# Allegro board JY02_V10_220108.brd
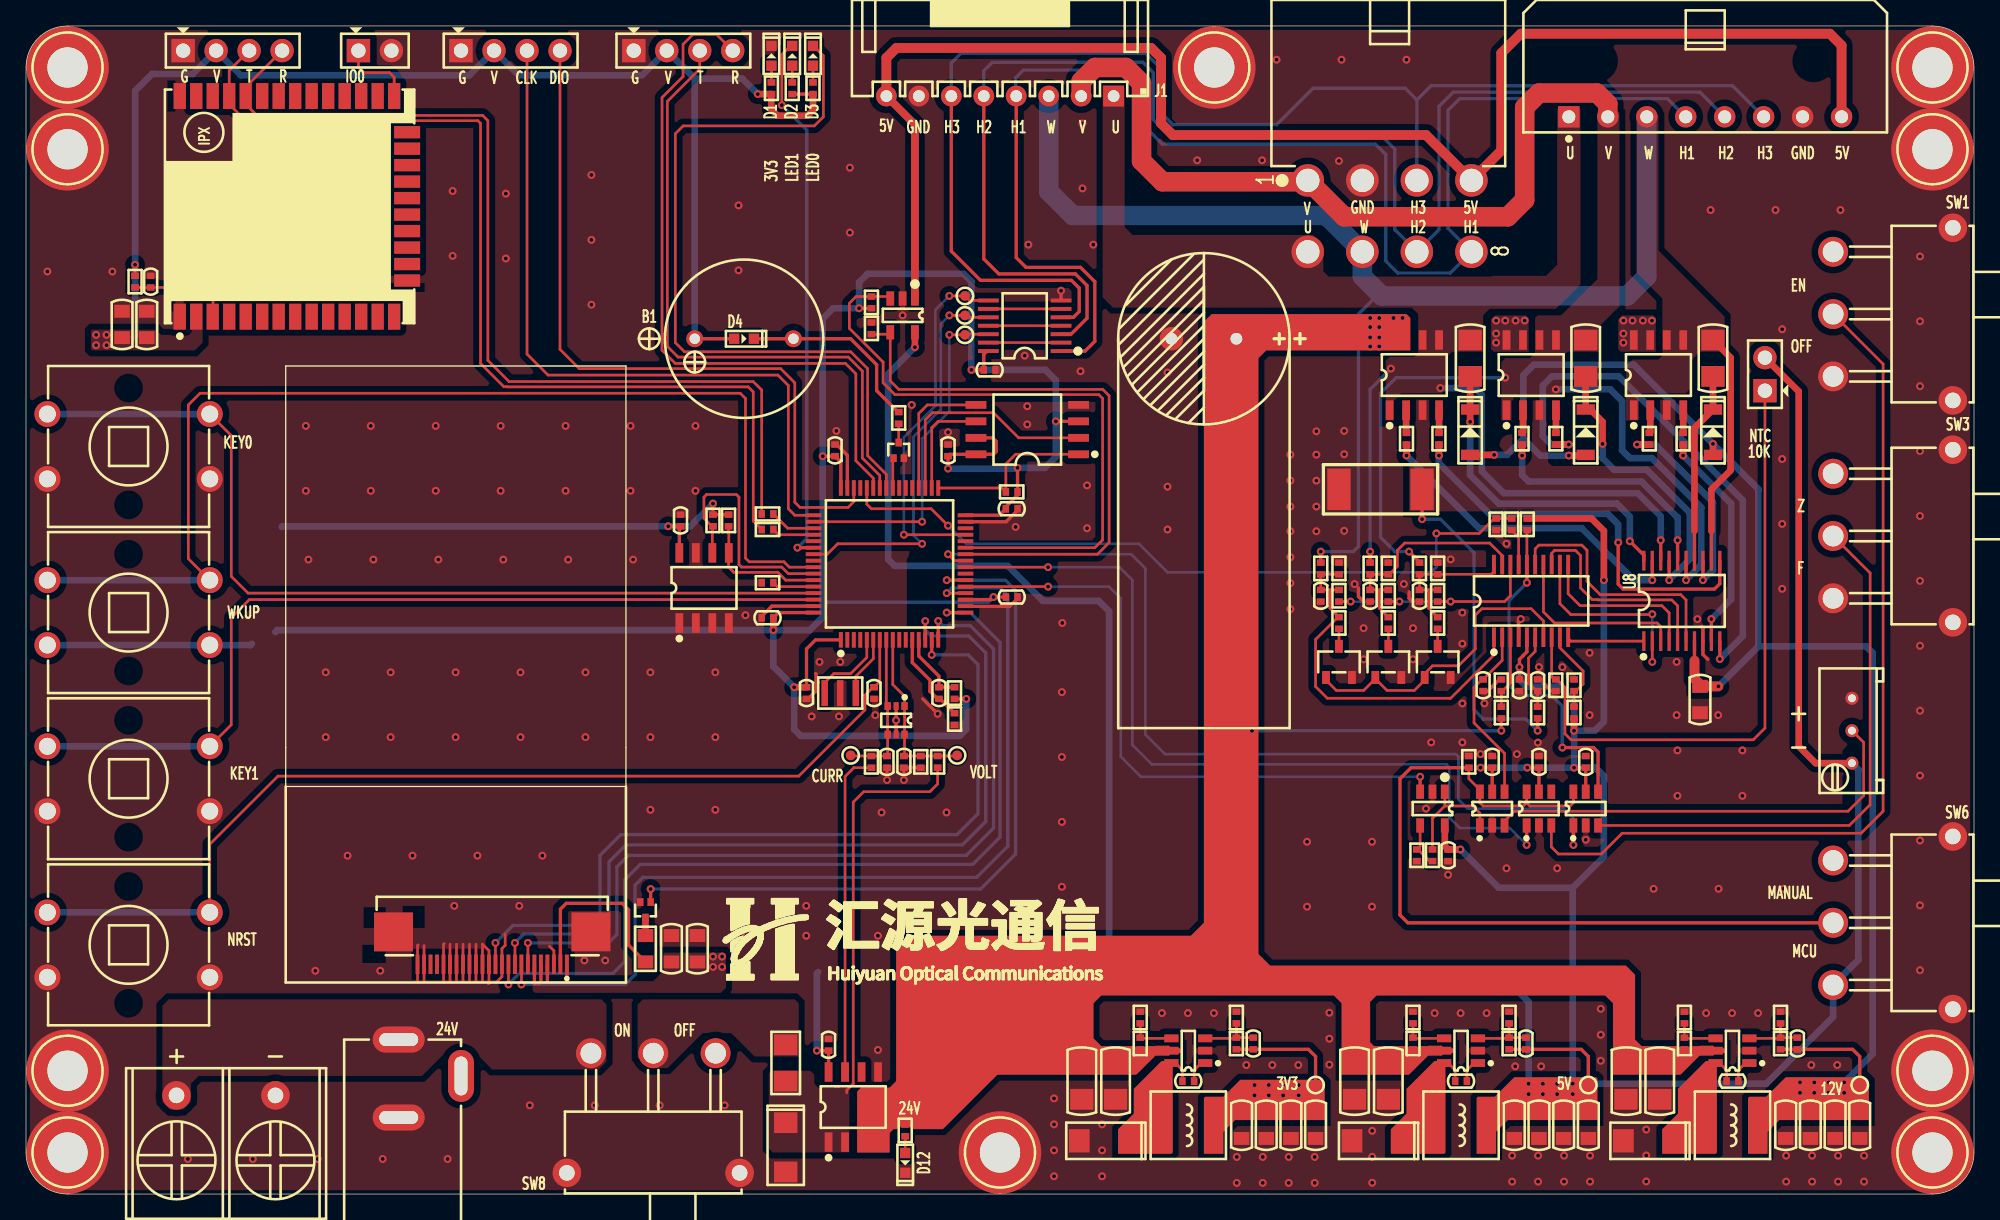
[diagram p0: board, top side]
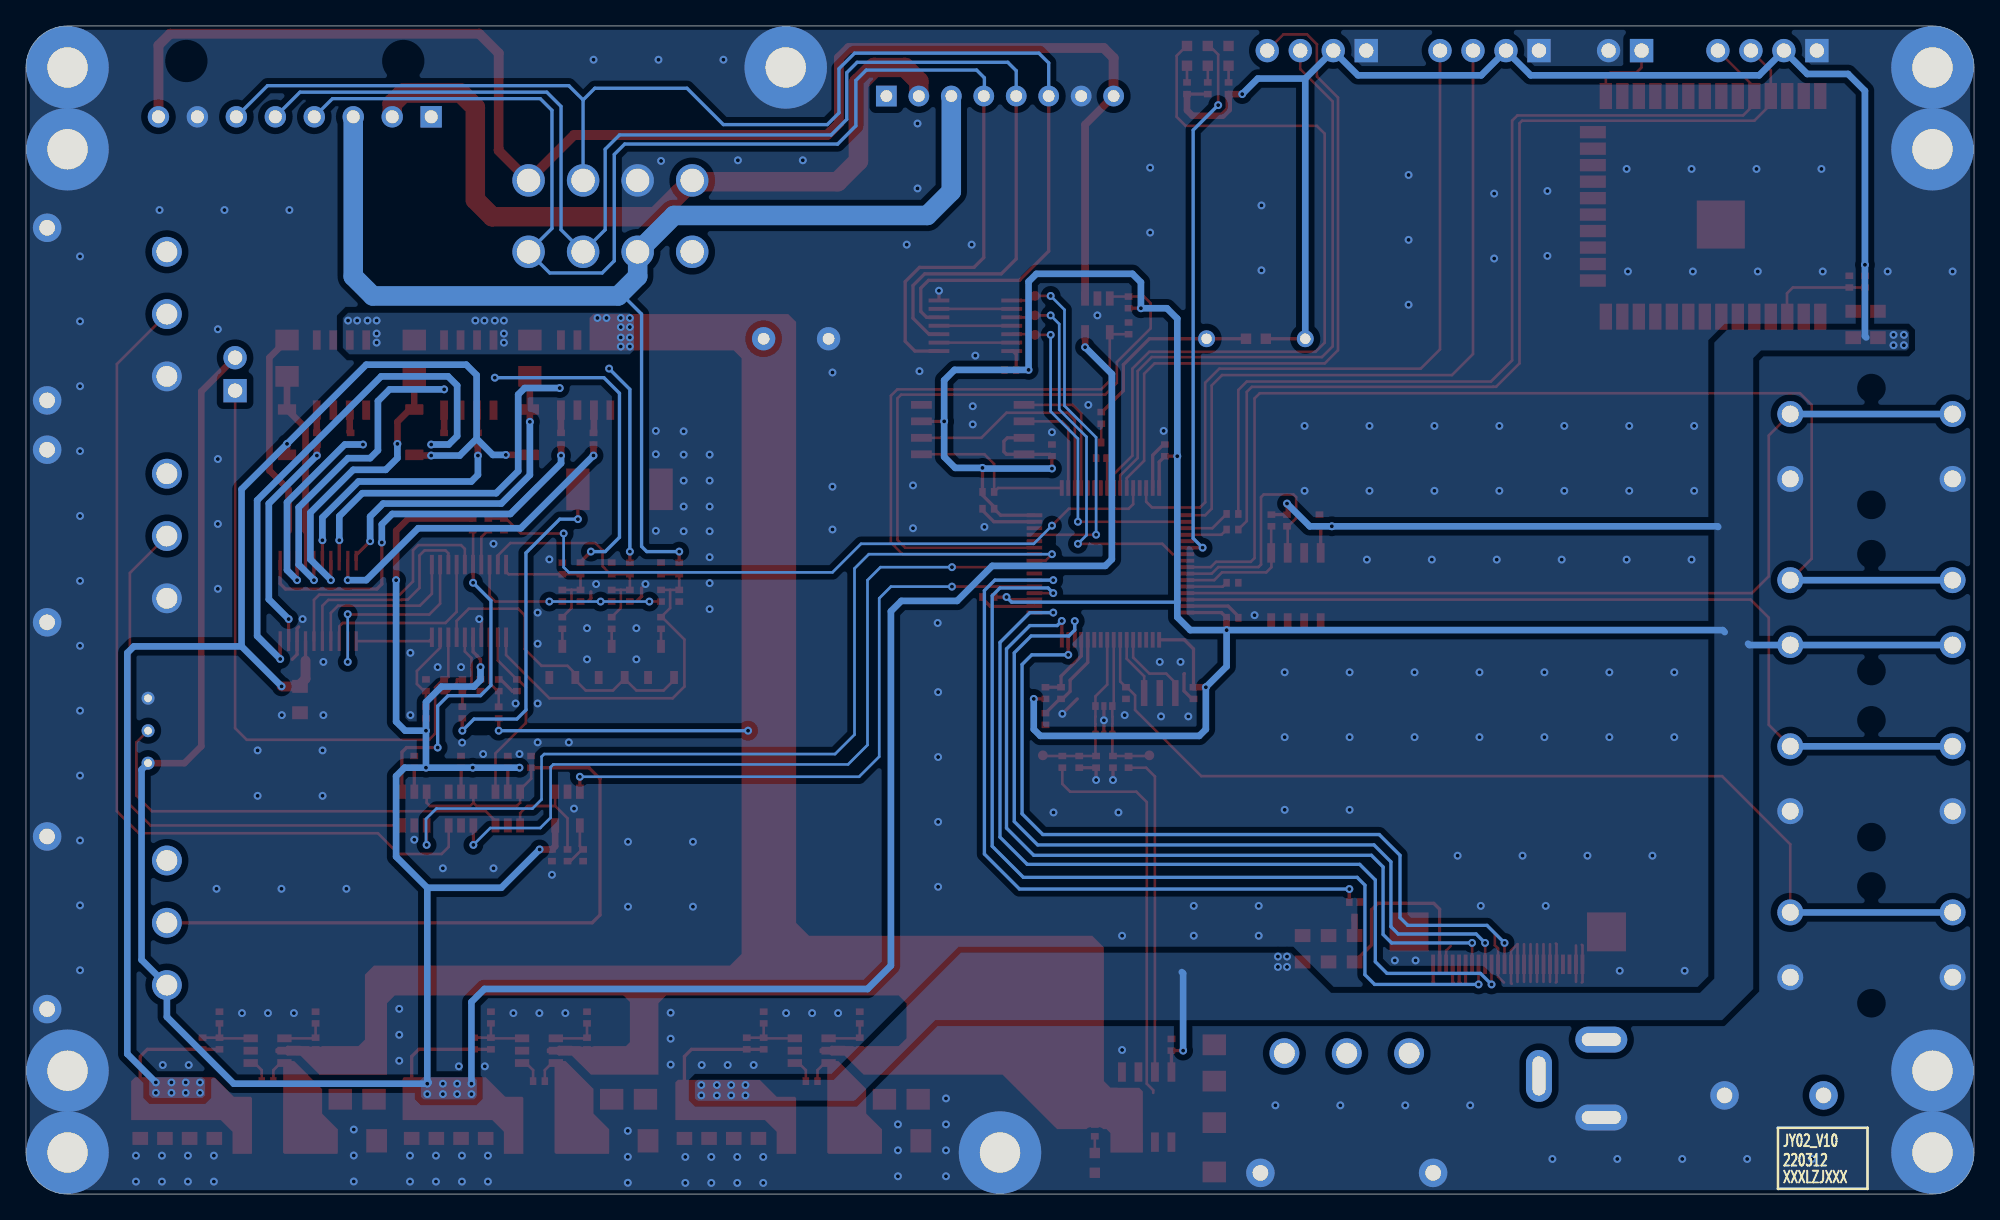
[diagram p1: board, bottom side, seen from below]

Outline 150 x 90 mm; copper layers: TOP, BOTTOM. Coordinates in mm from the lower left corner of the outline.
Outline path: 0,86.8 arc(0.94,89.06) 3.2,90 146.8,90 arc(149.06,89.06) 150,86.8 150,3.2 arc(149.06,0.94) 146.8,0 3.2,0 arc(0.94,0.94) 0,3.2 0,86.8

## Design rules (mm)
constraint set DEFAULT: min track width 0.203, pair gap 0.203

## Placement (name value [footprint] x y rotation side)
B1  -  [TMB12A03]  55.29 65.9 0 top
C1  100nF_50V  [C0402]  9.6 70.3 270 top
C2  10uF_25V  [C0805]  7.4 67 270 top
C3  10uF_25V  [C0805]  9.3 67 270 top
C4  1000uF_50V  [CAP-5R0-13X27]  90.7 65.9 180 top
C5  10uF_50V  [C1206]  111.2 64.4 90 top
C6  10uF_50V  [C1206]  120.1 64.4 90 top
C7  10uF_50V  [C1206]  129.9 64.4 90 top
C8  100nF_50V  [C0402]  74.2 63.5 180 top
C9  100nF_50V  [C0402]  62.3 57.3 270 top
C10  100nF_50V  [C0402]  71 57.3 90 top
C11  100nF_50V  [C0402]  75.9 52.8 180 top
C12  100nF_50V  [C0402]  50.4 51.9 270 top
C13  1uF_50V  [C0402]  99.7 46.1 270 top
C14  1uF_50V  [C0402]  103.5 46.1 270 top
C15  1uF_50V  [C0402]  107.3 46.1 270 top
C16  100nF_50V  [C0402]  75.9 46 180 top
C17  100nF_50V  [C0402]  57.1 44.4 0 top
C18  100nF_50V  [C0402]  112.2 39.2 270 top
C19  100nF_50V  [C0402]  115 39.2 90 top
C20  100nF_50V  [C0402]  116.4 39.2 90 top
C21  100nF_50V  [C0402]  60.1 38.6 90 top
C22  100nF_50V  [C0402]  65.3 38.6 270 top
C24  100nF_50V  [C0402]  70.3 38.6 90 top
C25  10uF_25V  [C0805]  128.9 38.1 270 top
C26  100nF_50V  [C0402]  66.3 33.3 90 top
C27  100nF_50V  [C0402]  67.6 33.3 270 top
C28  100nF_50V  [C0402]  112.9 33.3 90 top
C29  100nF_50V  [C0402]  116.5 33.3 90 top
C30  100nF_50V  [C0402]  120.1 33.3 90 top
C31  100nF_50V  [C0402]  109.5 26.1 90 top
C32  10uF_25V  [C0805]  49.7 18.9 270 top
C33  10uF_25V  [C0805]  51.7 18.9 270 top
C34  33pF_50V  [C0402]  94.5 11.6 270 top
C35  33pF_50V  [C0402]  115.5 11.6 270 top
C36  33pF_50V  [C0402]  136.4 11.6 270 top
C37  100nF_50V  [C0402]  61.8 11.5 90 top
C38  10uF_50V  [C1206]  81.3 8.7 270 top
C39  10uF_50V  [C1206]  83.9 8.7 270 top
C40  100nF_50V  [C0402]  89.5 8.7 0 top
C41  10uF_50V  [C1206]  102.3 8.7 270 top
C42  10uF_50V  [C1206]  104.9 8.7 270 top
C43  100nF_50V  [C0402]  110.5 8.7 0 top
C44  10uF_50V  [C1206]  123.2 8.7 270 top
C45  10uF_50V  [C1206]  125.8 8.7 270 top
C46  100nF_50V  [C0402]  131.4 8.7 0 top
C47  10uF_25V  [C0805]  93.6 5.3 270 top
C48  10uF_25V  [C0805]  95.5 5.3 270 top
C49  10uF_25V  [C0805]  97.4 5.3 270 top
C50  10uF_25V  [C0805]  99.3 5.3 270 top
C51  10uF_25V  [C0805]  114.6 5.3 270 top
C52  10uF_25V  [C0805]  116.5 5.3 270 top
C53  10uF_25V  [C0805]  118.4 5.3 270 top
C54  10uF_25V  [C0805]  120.3 5.3 270 top
C55  10uF_25V  [C0805]  135.5 5.3 270 top
C56  10uF_25V  [C0805]  137.4 5.3 270 top
C57  10uF_25V  [C0805]  139.3 5.3 270 top
C58  10uF_25V  [C0805]  141.2 5.3 270 top
D1  GREEN_0603  [LED0603]  57.4 87.7 90 top
D2  GREEN_0603  [LED0603]  59 87.7 90 top
D3  GREEN_0603  [LED0603]  60.6 87.7 90 top
D4  GREEN-0603/NI  [LED0603]  55.29 65.9 0 top
D5  1N4148  [SOD123]  111.2 58.7 270 top
D6  1N4148  [SOD123]  120.1 58.7 270 top
D7  1N4148  [SOD123]  129.9 58.7 270 top
D8  SS56F  [SMAF]  83 4.1 0 top
D9  SS56F  [SMAF]  104 4.1 0 top
D10  SS56F  [SMAF]  124.9 4.1 0 top
D11  SS56F  [SMAF]  58.5 3.6 90 top
D12  GREEN_0603  [LED0603]  67.7 2.4 270 top
DC1  -  [DC005]  28.7 5.9 90 top
F1  0469005.WR  [FUSE1206]  58.5 10.1 270 top
J1  -  [HX25035-8WA]  75 84.6 180 top
J2  -  [CN1X4-2P54-Z]  12.1 88.1 0 top
J3  -  [CN1X2-2P54-Z]  25.6 88.1 0 top
J4  -  [CN1X4-2P54-Z]  33.5 88.1 0 top
J5  -  [CN1X4-2P54-Z]  46.8 88.1 0 top
J6  -  [43650-0800]  129.3 83 180 top
J7  -  [HX42003-8WAF]  105 78.1 90 top
J8  3296W-50K  [3296W]  140.6 35.7 270 top
J9  0.5K-AS-24PWBG  [0R5K-AS-24PWBG]  35.9 17.7 180 top
J10  KF7.62-2P  [KF7R62-2P]  15.4 7.6 180 top
L1  SWPA5020S4R7  [L5020]  89.5 5.3 0 top
L2  SWPA5020S4R7  [L5020]  110.5 5.3 0 top
L3  SWPA5020S4R7  [L5020]  131.4 5.3 0 top
MH1  Hold-M3/NI  [HOLD6R35X3R10]  3.2 86.8 0 top
MH2  Hold-M3/NI  [HOLD6R35X3R10]  91.5 86.8 0 top
MH3  Hold-M3/NI  [HOLD6R35X3R10]  146.8 86.8 0 top
MH4  Hold-M3/NI  [HOLD6R35X3R10]  3.2 80.5 0 top
MH5  Hold-M3/NI  [HOLD6R35X3R10]  146.8 80.5 0 top
MH6  Hold-M3/NI  [HOLD6R35X3R10]  3.2 9.5 0 top
MH7  Hold-M3/NI  [HOLD6R35X3R10]  146.8 9.5 0 top
MH8  Hold-M3/NI  [HOLD6R35X3R10]  3.2 3.2 0 top
MH9  Hold-M3/NI  [HOLD6R35X3R10]  75 3.2 0 top
MH10  Hold-M3/NI  [HOLD6R35X3R10]  146.8 3.2 0 top
NOREF  -  []  0 0 90 top
NOREF#2  -  []  0 0 90 top
NOREF#3  -  []  0 0 0 top
NOREF#4  -  []  0 0 90 top
NOREF#5  -  []  0 0 0 top
NOREF#6  -  []  0 0 90 top
NOREF#7  -  []  0 0 0 top
NOREF#8  -  []  0 0 90 top
NOREF#9  -  []  -0.21 0 0 top
NOREF#10  -  []  0 0 0 top
NOREF#11  -  []  0 0 0 top
Q1  NCE6005AS  [SOIC8]  106.9 63.1 0 top
Q2  NCE6005AS  [SOIC8]  115.9 63.1 0 top
Q3  NCE6005AS  [SOIC8]  125.7 63.1 0 top
Q4  DTC043ZMT2L  [SOT723]  67.2 57.3 0 top
Q5  DTC043ZMT2L  [SOT723]  47.7 21.9 180 top
Q6  AO3400  [SOT23-3]  104.9 41 270 top
Q7  AO3400  [SOT23-3]  108.7 41 270 top
Q8  AO3400  [SOT23-3]  101.1 41 270 top
R1  10K  [R0402]  57.4 85.2 90 top
R2  10K  [R0402]  59 85.2 90 top
R3  10K  [R0402]  60.6 85.2 90 top
R4  10K  [R0402]  8.4 70.3 270 top
R5  100K  [R0402]  65.1 68.7 270 top
R6  100K  [R0402]  65.1 66.7 90 top
R8  1K  [R0402]  67.2 59.8 270 top
R9  51R  [R0402]  106.3 58.2 90 top
R10  51R  [R0402]  108.8 58.2 90 top
R11  51R  [R0402]  115.2 58.2 90 top
R12  51R  [R0402]  117.8 58.2 90 top
R13  51R  [R0402]  125 58.2 90 top
R14  51R  [R0402]  127.6 58.2 90 top
R15  0R02  [R2512]  104.3 54.3 0 top
R16  10K  [R0402]  75.9 54.1 180 top
R17  1K  [R0402]  57.1 52.4 0 top
R18  4.7K  [R0402]  52.9 51.9 90 top
R19  4.7K  [R0402]  54.1 51.9 90 top
R21  10K  [R0402]  115.6 51.6 90 top
R22  1K  [R0402]  57.1 51.2 0 top
R23  10K  [R0402]  99.7 48.2 270 top
R25  10K  [R0402]  103.5 48.2 270 top
R27  10K  [R0402]  107.3 48.2 270 top
R29  10K  [R0402]  57.1 47.1 180 top
R30  10K  [R0402]  101.1 48.2 270 top
R31  10K  [R0402]  101.1 46.1 270 top
R32  10K  [R0402]  104.9 48.2 270 top
R33  10K  [R0402]  104.9 46.1 270 top
R34  10K  [R0402]  108.7 48.2 270 top
R35  10K  [R0402]  108.7 46.1 270 top
R36  10K  [R0402]  113.6 39.2 270 top
R37  10K  [R0402]  114.4 51.6 270 top
R38  1K  [R0402]  117.8 39.2 90 top
R39  470R  [R0402]  119.2 39.2 270 top
R40  0R  [R0402]  71.5 38.6 270 top
R41  100K  [R0402]  113.6 37.1 270 top
R42  10K  [R0402]  116.4 37.1 270 top
R43  10K  [R0402]  113.2 51.6 90 top
R45  10K  [R0402]  119.2 37.1 270 top
R46  0R  [R0402]  71.5 36.6 270 top
R48  10K  [R0402]  65.1 33.3 90 top
R49  10K  [R0402]  68.9 33.3 90 top
R50  100K  [R0402]  70.2 33.3 270 top
R51  10K  [R0402]  111.1 33.3 270 top
R52  10K  [R0402]  107.1 26.1 270 top
R53  4.99K  [R0402]  108.3 26.1 270 top
R54  10R  [R0805]  47.7 18.9 90 top
R55  20K  [R0402]  85.8 13.6 270 top
R56  32.4K  [R0402]  93.2 13.6 270 top
R57  20K  [R0402]  106.8 13.6 270 top
R58  19.1K  [R0402]  114.2 13.6 270 top
R59  20K  [R0402]  127.7 13.6 270 top
R60  7.15K  [R0402]  135.1 13.6 270 top
R61  100K  [R0402]  85.8 11.6 90 top
R62  100K  [R0402]  93.2 11.6 270 top
R63  100K  [R0402]  106.8 11.6 90 top
R64  100K  [R0402]  114.2 11.6 270 top
R65  100K  [R0402]  127.7 11.6 90 top
R66  100K  [R0402]  135.1 11.6 270 top
R67  10K  [R0402]  67.7 4.9 270 top
R68  MF52A103F3950(A1)  [CN1X2-2P54-Z]  133.9 61.9 90 top
R69  330R  [R0402]  104.9 44 90 top
R70  330R  [R0402]  108.7 44 90 top
R71  330R  [R0402]  101.1 44 90 top
SW1  -  [SS-12D11G3R]  146.8 67.8 270 top
SW2  -  [B3F-4055]  7.9 57.6 180 top
SW3  -  [SS-12D11G3R]  146.8 50.7 270 top
SW4  -  [B3F-4055]  7.9 44.8 180 top
SW5  -  [B3F-4055]  7.9 32 180 top
SW6  -  [SS-12D11G3R]  146.8 20.9 270 top
SW7  -  [B3F-4055]  7.9 19.2 180 top
SW8  -  [SS-12D11G3R]  48.3 3.2 180 top
TP1  TP/NI  [TP-0R75]  72.3 69.2 270 top
TP2  TP/NI  [TP-0R75]  72.3 67.7 270 top
TP3  TP/NI  [TP-0R75]  72.3 66.2 270 top
TP4  TP/NI  [TP-0R75]  63.5 33.8 0 top
TP5  TP/NI  [TP-0R75]  71.7 33.8 0 top
TP6  TP/NI  [TP-0R75]  99.3 8.4 0 top
TP7  TP/NI  [TP-0R75]  120.3 8.4 0 top
TP8  TP/NI  [TP-0R75]  141.2 8.4 0 top
U1  -  [ESP32-WROOM-32U]  17.1 76.1 90 top
U2  AP2171WG-7  [SOT23-5]  67.5 67.7 180 top
U3  SN74LVC14APW  [TSSOP14]  76.9 66.9 90 top
U4  W25Q64JVSSIQ  [SOIC8_208]  77.1 58.9 90 top
U5  STM32F103RCT6  [LQFP64-10X10X0R5]  66.49 48.55 0 top
U6  AT24C512C-SSHM-T  [SOIC8]  52.21 46.7 0 top
U7  JY02A  [SSOP20-8R66X3R90X0R635]  115.9 45.7 0 top
U8  EG2124A  [TSSOP20]  127.5 45.7 0 top
U9  TPD4E1U06DCKR  [SOT363]  67 36.5 180 top
U10  TLV333IDBV  [SOT23-5]  108.3 29.7 180 top
U11  TS5A3159DBVR  [SOT23-6]  112.9 29.7 0 top
U12  TS5A3159DBVR  [SOT23-6]  116.5 29.7 0 top
U13  TS5A3159DBVR  [SOT23-6]  120.1 29.7 0 top
U14  BL9342  [SOT23-6]  89.5 11.05 90 top
U15  BL9342  [SOT23-6]  110.5 11.05 90 top
U16  BL9342  [SOT23-6]  131.4 11.05 90 top
U17  CC6920BSO-10A  [SOIC8]  63.7 6.7 0 top
X1  CSTCE8M00G15C99-R0  [X-3P-3R2X1R3-SMD]  62.7 38.6 0 top

## Library data of the parts
B1 = BEEP_HC12085P
C1 C8-C11 C16 C17 C21 C24 C26 C31 C37 = CAP NP_2
C2 C3 C5-C7 C13-C15 C18-C20 C22 C25 C28-C30 C32-C36 C38-C58 = CAP NP
C4 = CAPT_100UF_3528_6r3V_10%_LXXXX
C12 C27 = CAP NP_3
D1-D4 D12 = LED_4
D5-D11 = DIODE13_9
DC1 = DC005
F1 = FUSE
J1 = CONN RCPT 8
J2 J4 J5 = CONN RCPT 4
J3 J10 R68 = CONN RCPT 2
J6 = 43650-0801
J7 = HX30002-10A_2
J8 = CONN RCPT 3
J9 = 0.5K-AS-24PWBG
L1-L3 = INDUCTOR_0
MH1-MH10 = Hold_1
Q1-Q3 = IRF7351TRPBF
Q4 Q5 = DTC043ZMT2L
Q6-Q8 = MOS-P_0
R1-R6 R8-R19 R21-R23 R25 R27 R29-R43 R45 R46 R48-R67 R69-R71 = R_Generic
SW1 SW3 SW6 SW8 = SWITCH_3P
SW2 SW4 SW5 SW7 = SWITCH-SPST-4P
TP1-TP8 = TestPoint
U1 = ESP32-WROOM-32U
U2 = AP2171WG-7
U3 = SN74LVC14APW
U4 = W25Qxx
U5 = STM32F103RxT6
U6 = AT24C512
U7 = JY02A_2
U8 = EG2124A
U9 = TPD4E1U06DBVR
U10 = TLV333IDBV
U11-U13 = TS5A3159DBVR
U14-U16 = BL9342
U17 = CC6920BSO-10A
X1 = XTAL_5032_0

## Footprints (pads in the part's own frame, mm; a bottom-side part is the same pattern mirrored in y, then rotated)
0R5K-AS-24PWBG
  rect 0.3x1.5 smd: 1(-5.75,0) 2(-5.25,0) 3(-4.75,0) 4(-4.25,0) 5(-3.75,0) 6(-3.25,0) 7(-2.75,0) 8(-2.25,0) 9(-1.75,0) 10(-1.25,0) 11(-0.75,0) 12(-0.25,0) 13(0.25,0) 14(0.75,0) 15(1.25,0) 16(1.75,0) 17(2.25,0) 18(2.75,0) 19(3.25,0) 20(3.75,0) 21(4.25,0) 22(4.75,0) 23(5.25,0) 24(5.75,0)
  rect 3x3 smd: 25(7.6,-2.5) 26(-7.6,-2.5)
3296W
  round 1 hole 0.6: 1(-2.5,0) 2(0,0) 3(2.5,0)
43650-0800
  rect 1.65x1.65 hole 1: 1(10.5,0)
  round 1.65 hole 1: 2(7.5,0) 3(4.5,0) 4(1.5,0) 5(-1.5,0) 6(-4.5,0) 7(-7.5,0) 8(-10.5,0)
B3F-4055
  round 2 hole 1.3: 1(-6.25,2.5) 2(6.25,2.5) 3(-6.25,-2.5) 4(6.25,-2.5)
C0402
  rect 0.5x0.6 smd: 1(-0.45,0) 2(0.45,0)
C0805
  rect 1x1.2 smd: 1(-1.016,0) 2(1.016,0)
C1206
  rect 1.6x1.8 smd: 1(-1.4,0) 2(1.4,0)
CAP-5R0-13X27
  round 1.8 hole 0.9: 1(-2.5,0) 2(2.5,0)
CN1X2-2P54-Z
  rect 1.8x1.8 hole 1.1: 1(0,0)
  round 1.8 hole 1.1: 2(2.54,0)
CN1X4-2P54-Z
  rect 1.8x1.8 hole 1.1: 1(0,0)
  round 1.8 hole 1.1: 2(2.54,0) 3(5.08,0) 4(7.62,0)
DC005
  oval 2x4 hole 1x3: 1(6,0) 2(0,0)
  oval 4x2 hole 3x1: 3(3.2,-4.8)
ESP32-WROOM-32U
  rect 2x0.95 smd: 1(-8.5,5.26) 2(-8.5,3.99) 3(-8.5,2.72) 4(-8.5,1.45) 5(-8.5,0.18) 6(-8.5,-1.09) 7(-8.5,-2.36) 8(-8.5,-3.63) 9(-8.5,-4.9) 10(-8.5,-6.17) 11(-8.5,-7.44) 12(-8.5,-8.71) 13(-8.5,-9.98) 14(-8.5,-11.25) 25(8.5,-11.25) 26(8.5,-9.98) 27(8.5,-8.71) 28(8.5,-7.44) 29(8.5,-6.17) 30(8.5,-4.9) 31(8.5,-3.63) 32(8.5,-2.36) 33(8.5,-1.09) 34(8.5,0.18) 35(8.5,1.45) 36(8.5,2.72) 37(8.5,3.99) 38(8.5,5.26)
  rect 0.95x2 smd: 15(-5.715,-12.25) 16(-4.445,-12.25) 17(-3.175,-12.25) 18(-1.905,-12.25) 19(-0.635,-12.25) 20(0.635,-12.25) 21(1.905,-12.25) 22(3.175,-12.25) 23(4.445,-12.25) 24(5.715,-12.25)
  rect 3.7x3.7 smd: 39(-1.4,-2.4)
FUSE1206
  rect 1.6x1.8 smd: 1(-1.4,0) 2(1.4,0)
HOLD6R35X3R10
  round 6.35 hole 3.1: 1(0,0)
HX25035-8WA
  rect 1.6x1.6 hole 0.9: 1(-8.75,0)
  round 1.6 hole 0.9: 2(-6.25,0) 3(-3.75,0) 4(-1.25,0) 5(1.25,0) 6(3.75,0) 7(6.25,0) 8(8.75,0)
HX42003-8WAF
  round 2.5 hole 1.8: 1(0,6.3) 2(-5.5,6.3) 3(0,2.1) 4(-5.5,2.1) 5(0,-2.1) 6(-5.5,-2.1) 7(0,-6.3) 8(-5.5,-6.3)
KF7R62-2P
  round 2.2 hole 1.2: 1(-3.81,0) 2(3.81,0)
L5020
  rect 1.4x4.2 smd: 1(-1.95,0) 2(1.95,0)
LED0603
  rect 0.8x0.8 smd: 1(-0.762,0) 2(0.762,0)
LQFP64-10X10X0R5
  rect 0.3x1.2 smd: 1(-3.75,-5.85) 2(-3.25,-5.85) 3(-2.75,-5.85) 4(-2.25,-5.85) 5(-1.75,-5.85) 6(-1.25,-5.85) 7(-0.75,-5.85) 8(-0.25,-5.85) 9(0.25,-5.85) 10(0.75,-5.85) 11(1.25,-5.85) 12(1.75,-5.85) 13(2.25,-5.85) 14(2.75,-5.85) 15(3.25,-5.85) 16(3.75,-5.85) 33(3.75,5.85) 34(3.25,5.85) 35(2.75,5.85) 36(2.25,5.85) 37(1.75,5.85) 38(1.25,5.85) 39(0.75,5.85) 40(0.25,5.85) 41(-0.25,5.85) 42(-0.75,5.85) 43(-1.25,5.85) 44(-1.75,5.85) 45(-2.25,5.85) 46(-2.75,5.85) 47(-3.25,5.85) 48(-3.75,5.85)
  rect 1.2x0.3 smd: 17(5.85,-3.75) 18(5.85,-3.25) 19(5.85,-2.75) 20(5.85,-2.25) 21(5.85,-1.75) 22(5.85,-1.25) 23(5.85,-0.75) 24(5.85,-0.25) 25(5.85,0.25) 26(5.85,0.75) 27(5.85,1.25) 28(5.85,1.75) 29(5.85,2.25) 30(5.85,2.75) 31(5.85,3.25) 32(5.85,3.75) 49(-5.85,3.75) 50(-5.85,3.25) 51(-5.85,2.75) 52(-5.85,2.25) 53(-5.85,1.75) 54(-5.85,1.25) 55(-5.85,0.75) 56(-5.85,0.25) 57(-5.85,-0.25) 58(-5.85,-0.75) 59(-5.85,-1.25) 60(-5.85,-1.75) 61(-5.85,-2.25) 62(-5.85,-2.75) 63(-5.85,-3.25) 64(-5.85,-3.75)
R0402
  rect 0.5x0.6 smd: 1(-0.45,0) 2(0.45,0)
R0805
  rect 1x1.2 smd: 1(-1.016,0) 2(1.016,0)
R2512
  rect 1.8x3.2 smd: 1(-3.2,0) 2(3.2,0)
SMAF
  rect 1.6x1.8 smd: 1(-1.9,0) 2(1.9,0)
SOD123
  rect 0.8x1.4 smd: 1(1.75,0) 2(-1.75,0)
SOIC8
  rect 0.6x1.5 smd: 1(-1.9,-2.7) 2(-0.63,-2.7) 3(0.64,-2.7) 4(1.91,-2.7) 5(1.91,2.7) 6(0.64,2.7) 7(-0.63,2.7) 8(-1.9,2.7)
SOIC8_208
  rect 0.6x1.6 smd: 1(-1.905,-3.95) 2(-0.635,-3.95) 3(0.635,-3.95) 4(1.905,-3.95) 5(1.905,3.95) 6(0.635,3.95) 7(-0.635,3.95) 8(-1.905,3.95)
SOT23-3
  rect 1x0.6 smd: 1(1.2,-1) 2(1.2,1) 3(-1.2,0)
SOT23-5
  rect 0.6x1.1 smd: 1(-0.95,-1.3) 2(0,-1.3) 3(0.95,-1.3) 4(0.95,1.3) 5(-0.95,1.3)
SOT23-6
  rect 0.6x1.1 smd: 1(-0.95,-1.3) 2(0,-1.3) 3(0.95,-1.3) 4(0.95,1.3) 5(0,1.3) 6(-0.95,1.3)
SOT363
  rect 0.5x0.6 smd: 1(-0.65,-1.1) 3(0.65,-1.1) 4(0.65,1.1) 6(-0.65,1.1)
  rect 0.4x0.6 smd: 2(0,-1.1) 5(0,1.1)
SOT723
  rect 0.5x0.6 smd: 1(-0.4,-0.6) 2(0.4,-0.6) 3(0,0.6)
SS-12D11G3R
  round 2.2 hole 1.2: 1(-6.65,1.57) 5(6.65,1.57)
  round 2.3 hole 1.6: 2(-4.8,-7.65) 3(0,-7.65) 4(4.8,-7.65)
SSOP20-8R66X3R90X0R635
  rect 0.3x1.5 smd: 1(-2.868,-2.8) 2(-2.232,-2.8) 3(-1.597,-2.8) 4(-0.963,-2.8) 5(-0.328,-2.8) 6(0.307,-2.8) 7(0.943,-2.8) 8(1.577,-2.8) 9(2.212,-2.8) 10(2.848,-2.8) 11(2.848,2.8) 12(2.212,2.8) 13(1.577,2.8) 14(0.943,2.8) 15(0.307,2.8) 16(-0.328,2.8) 17(-0.963,2.8) 18(-1.597,2.8) 19(-2.232,2.8) 20(-2.868,2.8)
TMB12A03
  round 1.3 hole 0.8: 1(-3.8,0) 2(3.8,0)
TP-0R75
  round 0.75 smd: 1(0,0)
TSSOP14
  rect 0.3x1.6 smd: 1(-1.95,-2.8) 2(-1.3,-2.8) 3(-0.65,-2.8) 4(0,-2.8) 5(0.65,-2.8) 6(1.3,-2.8) 7(1.95,-2.8) 8(1.95,2.8) 9(1.3,2.8) 10(0.65,2.8) 11(0,2.8) 12(-0.65,2.8) 13(-1.3,2.8) 14(-1.95,2.8)
TSSOP20
  rect 0.25x1.52 smd: 1(-2.925,-3.1) 2(-2.275,-3.1) 3(-1.625,-3.1) 4(-0.975,-3.1) 5(-0.325,-3.1) 6(0.325,-3.1) 7(0.975,-3.1) 8(1.625,-3.1) 9(2.275,-3.1) 10(2.925,-3.1) 11(2.925,3.1) 12(2.275,3.1) 13(1.625,3.1) 14(0.975,3.1) 15(0.325,3.1) 16(-0.325,3.1) 17(-0.975,3.1) 18(-1.625,3.1) 19(-2.275,3.1) 20(-2.925,3.1)
X-3P-3R2X1R3-SMD
  rect 0.5x2 smd: 1(-1.2,0) 2(0,0) 3(1.2,0)

## Nets
GND: C1.1 C2.1 C3.1 C4.2 C8.1 C9.1 C10.2 C11.1 C12.1 C13.2 C14.2 C15.2 C16.1 C17.1 C18.2 C19.1 C20.2 C21.1 C22.2 C25.2 C26.1 C27.2 C28.2 C29.2 C30.2 C31.1 C32.1 C33.1 C37.2 C38.2 C39.2 C41.2 C42.2 C44.2 C45.2 C47.2 C48.2 C49.2 C50.2 C51.2 C52.2 C53.2 C54.2 C55.2 C56.2 C57.2 C58.2 D1.2(CATHODE) D8.1 D9.1 D10.1 D11.1 D12.2(CATHODE) DC1.2 J1.7 J2.1 J3.2 J4.1 J5.1 J6.7 J7.3 J8.1 J9.3 J9.11 J9.13 J9.14 J9.15 J9.16 J9.17 J9.18 J9.19 J9.20 J9.23 J9.24 J9.25 J9.26 J10.1 MH1.1 MH2.1 MH3.1 MH4.1 MH5.1 MH6.1 MH7.1 MH8.1 MH9.1 MH10.1 Q4.2 Q5.2 Q6.2(S) Q7.2(S) Q8.2(S) R6.2 R15.1 R29.2 R30.1 R32.1 R34.1 R36.1 R38.1 R39.1 R43.1 R46.2 R49.1 R51.1 R52.2 R55.1 R56.1 R57.1 R58.1 R59.1 R60.1 SW1.1 SW1.4 SW1.5 SW2.1 SW2.2 SW3.1 SW3.4 SW3.5 SW5.1 SW5.2 SW6.1 SW6.5 SW7.1 SW7.2 SW8.1 SW8.5 U1.1 U1.15 U1.38 U1.39 U2.2 U3.7 U4.4 U5.18 U5.31 U5.47 U5.63(VSS_4) U6.1 U6.2 U6.3 U6.4 U6.7(WP) U7.4 U8.8 U9.2 U9.5(NC) U10.2(V-) U11.2 U12.2 U13.2 U14.2 U15.2 U16.2 U17.5 X1.2
VCC_3.3V: B1.1(P) C2.2 C3.2 C8.2 C9.2 C10.1 C11.2 C12.2 C16.2 C17.2 C21.2 C32.2 C33.2 C34.2 C37.1 C47.1 C48.1 C49.1 C50.1 D4.1 J2.2 J4.2 J5.2 J9.1 J9.4 J9.5 J9.6 L1.2 R1.1 R2.1 R3.1 R4.1 R5.2 R16.1 R18.2 R19.2 R40.2 R62.2 SW4.1 SW4.2 TP6.1 U1.2 U3.14(VCC) U4.3(W\P\) U4.7 U4.8 U5.1 U5.19 U5.32 U5.48 U5.64 U6.8 U17.8
VCC_5V: C19.2 C28.1 C29.1 C30.1 C31.2 C35.2 C51.1 C52.1 C53.1 C54.1 J8.3 L2.2 R21.2 R45.2 R64.2 R68.2 SW6.4 TP7.1 U2.5 U7.5 U10.5 U11.5(V+) U12.5(V+) U13.5(V+)
VCC_5V_HALL: J1.8 J6.8 J7.7 U2.1(OUT)
VCC_12V: C25.1 C36.2 C55.1 C56.1 C57.1 C58.1 D5.1 D6.1 D7.1 L3.2 R66.2 TP8.1 U8.7
VCC_24V: C4.1 C38.1 C39.1 C41.1 C42.1 C44.1 C45.1 Q1.7 Q1.8 Q2.7 Q2.8 Q3.7 Q3.8 R41.2 R61.1 R63.1 R65.1 R67.1 U14.5(VIN) U15.5(VIN) U16.5(VIN) U17.3 U17.4
VCC_24V_IN: DC1.1 J10.2 SW8.4
VDDA: C24.2 R40.1 U5.13
VSSA: C24.1 R46.1 U5.12
BOOT0: R29.1 U5.60
CTL: R51.2 SW6.3 U11.6 U12.6 U13.6
EL: U12.4
EMF: R31.2 R33.2 R35.2 U7.18
EMF_ON: Q6.1 Q7.1 Q8.1 U7.7
EMFA: C14.1 R25.2 R32.2 R33.1 R69.2 U7.19
EMFB: C15.1 R27.2 R34.2 R35.1 R70.2 U7.20
EMFC: C13.1 R23.2 R30.2 R31.1 R71.2 U7.1
EN_MANUAL: SW1.3 U12.3
H1: J1.4 J6.4 J7.8 U3.1
H2: J1.5 J6.5 J7.6 U3.3
H3: J1.6 J6.6 J7.5 U3.5
HIN1: U7.10 U8.1
HIN2: U7.12 U8.2
HIN3: U7.14 U8.3
HO1: R9.1 U8.19
HO2: R11.1 U8.16
HO3: R13.1 U8.13
IO0: J3.1 U1.25
IS: C20.1 R42.1 U7.6
LEDK: J9.2 R54.1
LIN1: U7.11 U8.4
LIN2: U7.13 U8.5
LIN3: U7.15 U8.6
LO1: R10.1 U8.11
LO2: R12.1 U8.10
LO3: R14.1 U8.9
M: R37.2 U7.17
MOTOR_U: C5.2 J1.1 J6.1 J7.2 Q1.1 Q1.5 Q1.6 R25.1 U8.18
MOTOR_V: C6.2 J1.2 J6.2 J7.1 Q2.1 Q2.5 Q2.6 R27.1 U8.15
MOTOR_W: C7.2 J1.3 J6.3 J7.4 Q3.1 Q3.5 Q3.6 R23.1 U8.12(VS3)
NRST: C22.1 SW7.3 SW7.4 U5.7
OP_OUT: R53.1 U10.1 U11.1
OSC_IN: U5.5 X1.1
OSC_OUT: U5.6 X1.3
PA0/SCL: J9.9 U5.14
PA1/SDA: J9.12 U5.15
PA2/RES: J9.7 U5.16
PA3/DC: J9.10 U5.17
PA4/CS: J9.8 U5.20
PA5/VREF: U5.21 U10.3
PA6/BLK: Q5.1 U5.22
PA8/LED0: D3.2(CATHODE) U5.41
PA9/USART1_TX: J5.3 U5.42
PA10/USART1_RX: J5.4 U5.43
PA11/SPEED: R37.1 R43.2 U5.44
PA15/H1: TP3.1 U3.12 U5.50
PB0/CTL_HALL: R6.1 U2.4 U5.26
PB1/HALL_OC: R5.1 U2.3 U5.27
PB3/H2: TP2.1 U3.10 U5.55
PB5/WK_UP: SW4.3 SW4.4 U5.57
PB6/IIC_SCL: R18.1 U5.58 U6.6
PB7/IIC_SDA: R19.1 U5.59 U6.5
PB8/KEY0: SW2.3 SW2.4 U5.61
PB9/KEY1: SW5.3 SW5.4 U5.62
PB10/H3: TP1.1 U3.8 U5.29
PB12/SPI2_CS: R16.2 U4.1 U5.33
PB13/SPI2_SCK: U4.6 U5.34
PB14/SPI2_MISO: U4.2 U5.35
PB15/SPI2_MOSI: U4.5 U5.36
PC0/WORK_CURR: C26.2 R48.2 TP4.1 U5.8 U9.3 U9.4
PC1/WORK_VOLT: C27.1 R49.2 R50.1 TP5.1 U5.9 U9.1 U9.6
PC4/EN: U5.24 U12.1
PC5/Z/F: U5.25 U13.1
PC9/BEEP: Q4.1 U5.40
PC10/USART3_TX: R17.2 U5.51
PC11/USART3_RX: R22.2 U5.52
PD2/LED1: D2.2(CATHODE) U5.54
SWCLK: J4.3 U5.49
SWDIO: J4.4 U5.46
TC: R38.2 R68.1 U7.8
TORQUE: R39.2 R45.1 U7.9
U0_RX: J2.4 R17.1 U1.34
U0_TX: J2.3 R22.1 U1.35(TXD0)
VB1: C5.1 D5.2(ANODE_2) U8.20
VB2: C6.1 D6.2(ANODE_2) U8.17
VB3: C7.1 D7.2(ANODE_2) U8.14
VOD: R36.2 R41.1 U7.3
VR: C18.1 U7.2 U11.4
VR_MANUAL: J8.2 U11.3
Z/F: R21.1 U7.16(Z/F) U13.4
Z/F_MANUAL: SW3.3 U13.3
N17026698: D2.1 R2.2
N17026724: D1.1 R1.2
N17062865: D3.1 R3.2
N17066432: D11.2(ANODE_2) F1.2 R50.2 U17.1 U17.2
N17082570: F1.1 SW8.3
N17083504: C36.1 R60.2 R66.1 U16.3
N17083827: R59.2 R65.2 U16.4
N17083986: C46.2 U16.1
N17083989: C46.1 D10.2(ANODE_2) L3.1 U16.6
N17085455: R57.2 R63.2 U15.4
N17085459: C35.1 R58.2 R64.1 U15.3
N17085552: C43.1 D9.2(ANODE_2) L2.1 U15.6
N17085554: C43.2 U15.1
N17086217: R55.2 R61.2 U14.4
N17086221: C34.1 R56.2 R62.1 U14.3
N17086314: C40.1 D8.2(ANODE_2) L1.1 U14.6
N17086316: C40.2 U14.1
N17111393: Q1.2 R9.2
N17111395: Q1.3(S2) Q2.3(S2) Q3.3(S2) R15.2 R42.2
N17111400: Q1.4 R10.2
N17111480: Q2.2 R11.2
N17111487: Q2.4 R12.2
N17111504: Q3.2 R13.2
N17111511: Q3.4 R14.2
N17111630: U3.6 U3.9
N17111633: U3.4 U3.11
N17111636: U3.2 U3.13
N17119104: R52.1 R53.2 U10.4
N17120846: R48.1 U17.7
N17129272: C1.2 R4.2 U1.3
N17133162: B1.2 D4.2(CATHODE) R8.1
N17136365: Q5.3 R54.2
N17144294: D12.1 R67.2
N17151200: Q6.3 R69.1
N17151376: Q7.3 R70.1
N17151530: Q8.3 R71.1
N171331741: Q4.3 R8.2

Pads without a net: DC1 3; J9 21 22; SW1 2; SW3 2; SW6 2; SW8 2; U1 4 5 6 7 8 9 10 11 12 13 14 16 17 18 19 20 21 22 23 24 26 27 28 29 30 31 32 33 36 37; U5 2 3 4 10 11 23 28 30 37 38 39 45 53 56; U17 6

## Via types
v1: diameter 0.61, hole 0.305, TOP to BOTTOM, 404 vias

## Routing (per net, layer and track width the routed paths; a pad name or vN(x,y) marks a point on that pad's centre or on a via; arc(x,y) is an arc through that point)
GND: length 71.8
  TOP w0.203: 35.15,16.35 J9.14 35.15,19.25 35.65,18.75 J9.13 35.65,16.25 35.6,16.2 ; 30.2,16.3 30.15,16.35 J9.24 30.15,19.15 30.2,19.2 ; C20.2 116.82,39.65 116.82,39.38 117.45,38.75 R38.1 ; 34.65,16.35 J9.15 34.65,19.25 ; 36.9,20 36.9,19.17 36.65,18.92 J9.11 36.65,16.75 36.2,16.3 ; 32.65,19.25 J9.19 32.65,16.35 ; 33.65,19.25 J9.17 33.65,16.35 ; 34.15,16.35 J9.16 34.15,19.25 ; 33.15,19.25 J9.18 33.15,16.35 ; 30.65,16.35 J9.23 30.65,19.15 ; 32.2,16.3 32.15,16.35 J9.20 32.15,19.25 32.2,19.3 ; 40.3,19.1 40.65,18.75 J9.3
  TOP w0.254: C17.1 56.65,44.52 57.43,45.3 U5.63 ; 60.8,40.1 60.83,40.07 60.83,38.77 60.22,38.15 C21.1 ; U5.31 75.47,51.8 76.35,52.68 C11.1 ; U3.7 v1(79.7,69.6) ; C18.2 112.55,38.75 113.45,39.65 R36.1 ; v1(67.6,31.9) C27.2 R49.1 ; U9.5 v1(67,36.5) U9.2 ; 106.5,46.4 106.5,45.9 106.7,45.7 ; C16.1 76.35,45.88 75.75,45.28 72.36,45.28 U5.18 ; C26.1 v1(66.3,31.9) ; 69.05,38.15 v1(70.2,37) ; 129,43.7 129.12,43.58 U8.8 129.12,41.58 129.5,41.2 ; U5.47 63.24,56.92 62.42,57.75 C9.1 ; 102.95,45.7 102.6,46.05 102.6,46.7 ; U7.4 114.94,44.06 114.9,44.1
  vias: v1(1.65,71.08) v1(6.65,71.08) v1(11.65,71.08) v1(11.75,78.98) v1(12.47,2.7) v1(16.65,71.08) v1(16.75,78.98) v1(17.47,2.7) v1(21.55,59.18) v1(21.55,54.18) v1(21.65,71.08) v1(21.75,78.98) v1(21.75,48.88) v1(22.28,17.2) v1(22.47,2.7) v1(23.08,40.2) v1(23.08,35.2) v1(24.76,26.07) v1(26.55,59.18) v1(26.55,54.18) v1(26.65,71.08) v1(26.75,78.98) v1(26.75,48.88) v1(27.28,17.2) v1(27.47,2.7) v1(28.08,40.2) v1(28.08,35.2) v1(29.76,26.07) v1(31.55,59.18) v1(31.55,54.18) v1(31.75,48.88) v1(32.47,2.7) v1(32.85,77.28) v1(32.85,72.28) v1(32.98,22.2) v1(33.08,40.2) v1(33.08,35.2) v1(34.76,26.07) v1(36.55,59.18) v1(36.55,54.18) v1(36.75,48.88) v1(36.95,77.08) v1(36.95,72.08) v1(37.98,22.2) v1(38.08,40.2) v1(38.08,35.2) v1(38.8,6.83) v1(39.76,26.07) v1(41.55,59.18) v1(41.55,54.18) v1(41.75,48.88) v1(43,18) v1(43.08,40.2) v1(43.08,35.2) v1(43.54,78.52) v1(43.54,73.52) v1(43.54,68.52) v1(43.8,6.83) v1(44.6,18) v1(46.55,59.18) v1(46.55,54.18) v1(46.75,48.88) v1(48.08,40.2) v1(48.08,35.2) v1(48.08,29.6) v1(48.8,6.83) v1(51.55,59.18) v1(51.55,54.18) v1(53.08,40.2) v1(53.08,35.2) v1(53.08,29.6) v1(53.8,6.83) v1(54.87,76.17) v1(54.87,71.17) v1(55.08,22.2) v1(55.08,19.9) v1(55.4,44.6) v1(60.08,22.2) v1(60.08,19.9) v1(60.5,36.8) v1(61.1,41) v1(62.4,58.8) v1(62.6,36.8) v1(62.7,41) v1(63.44,79.08) v1(63.44,74.08) v1(65.4,36.9) v1(65.6,19.9) v1(65.6,11.1) v1(65.88,29.4) v1(67.5,67.7) v1(68.2,60.8) v1(70.88,29.4) v1(71,58.7) v1(76.2,51.4) v1(76.9,64.6) v1(77.1,60.7) v1(77.1,59.3) v1(77.18,73.15) v1(79.16,7.37) v1(79.16,5.37) v1(79.16,3.37) v1(79.16,1.37) v1(79.8,44) v1(79.77,38.67) v1(79.77,33.67) v1(79.77,28.67) v1(79.77,23.67) v1(81.2,63.4) v1(81.35,82.48) v1(81.35,77.48) v1(81.7,54.6) v1(81.7,51.3) v1(82.18,73.15) v1(82.86,5.37) v1(82.86,3.37) v1(82.86,1.37) v1(87.47,13.94) v1(87.9,63.3) v1(87.9,54.5) v1(87.9,51.2) v1(89.47,13.94) v1(90.18,79.65) v1(91.47,13.94) v1(93.23,2.86) v1(93.23,0.86) v1(93.97,9.94) v1(95.18,79.65) v1(95.23,2.86) v1(95.23,0.86) v1(95.97,9.94) v1(96.3,87.4) v1(97.23,2.86) v1(97.23,0.86) v1(97.36,56.97) v1(97.36,54.97) v1(97.36,52.97) v1(97.36,51.07) v1(97.36,49.07) v1(97.36,47.07) v1(97.36,45.07) v1(97.97,9.94) v1(98.64,27.14) v1(98.64,22.14) v1(99.23,2.86) v1(99.23,0.86) v1(99.36,58.77) v1(99.36,56.97) v1(99.36,54.97) v1(99.36,52.97) v1(99.36,51.07) v1(100.36,13.97) v1(100.36,11.97) v1(100.36,9.97) v1(101.1,79.6) v1(101.3,87.4) v1(101.5,58.8) v1(101.5,57) v1(101.5,51.1) v1(102.3,47) v1(103,43.6) v1(103,41.2) v1(103.64,27.14) v1(103.64,22.14) v1(103.66,4.87) v1(103.66,2.87) v1(103.66,0.87) v1(106.1,47) v1(106.3,87.4) v1(106.8,43.6) v1(106.8,41.2) v1(107.8,29.7) v1(108.2,34.8) v1(108.47,13.94) v1(109.5,24.6) v1(109.7,48.9) v1(110.47,13.94) v1(110.6,44.8) v1(110.6,42.4) v1(110.6,37.8) v1(110.6,34.8) v1(112,33.9) v1(112.3,37.8) v1(112.47,13.94) v1(114,50.1) v1(114,25.1) v1(114.43,2.96) v1(114.43,0.96) v1(114.67,9.84) v1(114.8,33.9) v1(115.1,44.3) v1(116.42,34.78) v1(116.43,2.96) v1(116.43,0.96) v1(116.5,40.6) v1(116.67,9.84) v1(117.9,25.1) v1(118.3,40.6) v1(118.43,2.96) v1(118.43,0.96) v1(120.1,27.3) v1(120.4,41.7) v1(120.4,36.9) v1(120.43,2.96) v1(120.43,0.96) v1(121.26,14.27) v1(121.26,12.27) v1(121.26,10.27) v1(124.76,4.97) v1(124.76,2.97) v1(124.76,0.97) v1(125.33,23.52) v1(127.1,41) v1(127.1,36.9) v1(127.16,34.18) v1(127.16,30.68) v1(128.7,44.3) v1(129.37,13.94) v1(129.72,75.82) v1(130.3,36.9) v1(130.33,23.52) v1(131.37,13.94) v1(132.16,34.18) v1(132.16,30.68) v1(133.37,13.94) v1(134.72,75.82) v1(135.23,66.63) v1(135.23,56.63) v1(135.23,51.63) v1(135.23,46.63) v1(135.33,23.52) v1(135.53,2.96) v1(135.53,0.96) v1(137.47,9.94) v1(137.53,2.96) v1(137.53,0.96) v1(139.47,9.94) v1(139.53,2.96) v1(139.53,0.96) v1(139.72,75.82) v1(141.53,2.96) v1(141.53,0.96) v1(145.84,72.24) v1(145.84,67.24) v1(145.84,62.24) v1(145.84,57.24) v1(145.84,52.24) v1(145.84,47.24) v1(145.84,42.24) v1(145.84,37.24) v1(145.84,32.24) v1(145.84,27.24) v1(145.84,22.24) v1(145.84,17.24)
VCC_3.3V: length 369.3
  TOP w0.203: R4.1 v1(8.4,71.6)
  TOP w0.254: U5.64 57.95,44.8 C17.2 ; J9.5 39.65,16.35 39.5,16.2 ; v1(71,55.9) C10.1 71.14,56.99 U4.8 73.16,57 74.5,57 74.7,57.2 74.7,58 74.44,58.27 U4.7 ; R19.2 R18.2 v1(52.9,53.2) ; U5.32 74.95,52.3 C11.2 75.45,52.95 76.35,53.85 R16.1 v1(76.35,55.95) ; C16.2 v1(74.5,46) 74.3,45.8 U5.19 ; 40.1,16.3 40.15,16.35 J9.4 ; 50.31,49.4 50.31,51.36 C12.2 v1(49.45,51.45) ; R40.2 v1(72.4,38.15) ; R62.2 C34.2 98.75,11.15 99.3,10.6 TP6.1 C50.1 ; C21.2 60.1,42 60.8,42.7 U5.1 ; J9.1 41.65,16.35 41.6,16.3 ; R2.1 R3.1 ; 39.2,16.2 39.15,16.25 J9.6 ; D4.1 B1.1 ; v1(60.9,11.05) C37.1 U17.8 ; v1(61.35,56.85) C9.2 62.74,56.41 U5.48 ; v1(72.8,63.5) C8.2 73.75,64.7 74,64.95 U3.14 ; R5.2 v1(64.15,68.25) ; U4.3 v1(79.3,59.53)
  TOP w0.508: C17.2 v1(57.55,43.45) ; R3.1 60.6,83.5 60.19,83.09 57.86,83.09 57.39,83.56 57.39,84.74 R1.1 v1(56.35,84.75) ; C21.2 v1(59.15,39.05)
  BOTTOM w0.254: 61.35,45.6 74.1,45.6 v1(74.5,46)
  BOTTOM w0.508: 51.49,85.95 J5.2 47.44,86.2 37.94,86.2 J4.2 34.14,86.2 16.54,86.2 J2.2 12.84,86.3 9.7,86.3 8.4,85 v1(8.4,71.6) 8.4,66.1 8.3,66 ; 51.49,85.95 55.15,85.95 v1(56.35,84.75) ; 51.49,85.95 B1.1 ; 19.7,51.4 19.75,51.45 v1(49.45,51.45) 51.15,51.45 v1(52.9,53.2) ; v1(57.55,43.45) 60.35,43.45 61.35,44.45 v1(61.35,56.85) 61.35,67.45 62.15,68.25 v1(64.15,68.25) 64.15,70.25 64.8,70.9 72.2,70.9 72.8,70.3 v1(72.8,63.5) 78.5,63.5 79.3,62.7 v1(79.3,59.53) 79.3,56.8 78.45,55.95 v1(76.35,55.95) 76.3,55.9 v1(71,55.9) ; v1(57.55,43.45) 57.55,40.65 v1(59.15,39.05) 59.15,35.81 59.66,35.3 71.89,35.3 72.4,35.81 v1(72.4,38.15) ; v1(57.55,43.45) 19.35,43.45 19.2,43.3 ; SW4.2 SW4.1 17.3,42.3 17.4,42.4 ; v1(60.9,11.05) 60.9,17 61,17.1
  vias: v1(5.4,66.2) v1(5.4,65.4) v1(6.2,66.2) v1(6.2,65.4) v1(52.9,18.3) v1(52.9,17.5) v1(53.6,18.3) v1(53.6,17.5) v1(94.6,8.4) v1(94.6,7.6) v1(95.7,8.4) v1(95.7,7.6) v1(96.8,8.4) v1(96.8,7.6) v1(98,8.4) v1(98,7.6)
VCC_5V: length 287.6
  TOP w0.254: v1(115.6,32.85) C29.1 U12.5 ; v1(112,32.85) C28.1 U11.5 ; U13.5 C30.1 v1(119.2,32.85) ; C19.2 v1(115,40.6) 115,41.2 115.27,41.47 115.27,41.48 115.57,41.78 U7.5 ; R64.2 C35.2 119.75,11.15 120.3,10.6 TP7.1 C54.1
  TOP w0.508: J8.3 137.8,33.2 136.5,34.5 136.5,61.84 R68.2 ; v1(110.45,26.55) C31.2 109.25,26.8 U10.5 ; v1(121.5,47.3) 121.5,51.1 120.55,52.05 R21.2 ; U2.5 v1(68.45,65.25) ; v1(119.2,35.7) R45.2
  BOTTOM w0.508: v1(115,40.6) 115,39.61 115.51,39.1 118,39.1 119.2,37.9 v1(119.2,35.7) ; v1(121.5,47.3) 121.5,36.4 120.8,35.7 v1(119.2,35.7) ; v1(112,32.85) v1(115.6,32.85) v1(119.2,32.85) ; 119.1,23.6 119.1,8.7 119,8.6 v1(119.1,8.5) 134,8.5 139.15,13.65 SW6.4 141.1,18.05 141.1,32.7 J8.3 ; 119.1,23.6 113.4,23.6 v1(110.45,26.55) ; 119.1,23.6 121.5,26 121.5,32.2 120.85,32.85 v1(119.2,32.85) ; v1(119.2,32.85) v1(119.2,35.7) ; v1(115.7,8.5) 115.7,14.8 114.7,15.8 85.2,15.8 83.4,17.6 83.4,44.9 82.6,45.7 78.3,45.7 75.6,48.4 66.9,48.4 66.39,48.91 66.39,63.19 v1(68.45,65.25)
  vias: v1(115.7,7.7) v1(116.8,8.5) v1(116.8,7.7) v1(117.9,8.5) v1(117.9,7.7) v1(119.1,7.7)
VCC_5V_HALL: length 115.4
  TOP w0.6: U2.1 68.45,82.4 J1.8
  TOP w0.762: J6.8 139.8,88.5 138.9,89.4 115.1,89.4 113.6,87.9 113.6,80.4 J7.7 107.8,81.6 88.3,81.6 87.4,82.5 87.4,87.54 86.64,88.3 67.01,88.3 66.25,87.54 J1.8
VCC_12V: length 114.1
  TOP w0.254: 128.47,41.1 U8.7 ; 128.47,39.7 128.47,39.54 C25.1 ; C58.1 TP8.1 141.2,10.6 140.65,11.15 C36.2 R66.2
  TOP w0.508: v1(118.8,56.9) 120.05,56.9 D6.1 ; D7.1 v1(129.9,57.8) ; D5.1 v1(113.05,56.95)
  TOP w0.762: 128.47,41.1 128.47,39.7 128.9,39.27 C25.1 v1(130.32,39.12)
  BOTTOM w0.508: v1(140,8.6) 142.2,10.8 142.2,41.69 141.69,42.2 133.4,42.2 ; 133.4,42.2 133.4,54.3 v1(129.9,57.8) 123.8,63.9 116.1,63.9 115.3,63.1 115.3,58.2 ; 133.4,42.2 v1(130.32,39.12) ; 115.3,58.2 116.6,56.9 v1(118.8,56.9) ; 115.3,58.2 114.05,56.95 v1(113.05,56.95)
  vias: v1(136.6,8.6) v1(136.6,7.8) v1(137.7,8.6) v1(137.7,7.8) v1(138.8,8.6) v1(138.8,7.8) v1(140,7.8)
VCC_24V: length 29.2
  TOP w0.254: R41.2 v1(113.6,35.7) ; 108,11.3 108.95,11.3 U15.5 108.95,10.8 107.6,10.8 ; 128.5,10.8 129.85,10.8 U16.5 129.85,11.3 128.9,11.3 ; 86.6,10.8 87.95,10.8 U14.5 87.95,11.3 87,11.3
  BOTTOM w0.254: v1(113.6,35.7) v1(94.4,35.7)
  vias: v1(103.5,67.5) v1(103.5,66.8) v1(103.5,66) v1(103.5,65.3) v1(104.2,67.5) v1(104.2,66.8) v1(104.2,66) v1(104.2,65.3) v1(105.3,67.5) v1(106,67.5) v1(113.2,67.3) v1(113.2,66.3) v1(113.2,65.6) v1(113.9,67.3) v1(114.7,67.3) v1(115.4,67.3) v1(123,67.3) v1(123,66.3) v1(123,65.6) v1(123.7,67.3) v1(124.5,67.3) v1(125.2,67.3)
VDDA: length 5.5
  TOP w0.254: U5.13 68.74,41.46 70.3,39.9 C24.2 R40.1
VSSA: length 7.1
  TOP w0.254: R46.1 70.4,38.15 C24.1 70.18,38.15 69.6,38.73 69.6,39.6 68.24,40.96 U5.12
BOOT0: length 3.2
  TOP w0.203: U5.60 57.85,46.8 R29.1
CTL: length 62.1
  TOP w0.203: 115.55,30.15 115.8,29.9 118.9,29.9 119.15,30.15 U13.6 ; 115.55,30.15 U12.6 ; 115.55,30.15 115.3,29.9 112.2,29.9 111.95,30.15 U11.6 111.95,31.15 111.1,32 R51.2
  TOP w0.254: SW6.3 106.4,20.9 105.8,21.5 105.8,32 106.65,32.85 R51.2
EMF: length 17.6
  TOP w0.203: R31.2 v1(102,45.65) ; R35.2 v1(109.7,45.65) 113.85,45.65 114.3,46.1 114.3,48.5 U7.18 ; R33.2 v1(105.75,45.65)
  BOTTOM w0.203: v1(102,45.65) v1(105.75,45.65) v1(109.7,45.65)
EMF_ON: length 24.2
  TOP w0.203: Q6.1 103.9,39.7 ; 103.9,39.7 103,38.8 100.9,38.8 100.1,39.6 Q8.1 ; 103.9,39.7 104.8,38.8 106.9,38.8 107.7,39.6 Q7.1 107.7,40.1 108.3,40.7 110.3,40.7 111.6,42 111.6,44.6 112.1,45.1 115.9,45.1 116.84,44.16 U7.7
EMFA: length 18
  TOP w0.203: 104.2,46.55 C14.1 R25.2 R32.2 104.98,47.75 105.6,48.37 105.6,49.6 106.16,50.16 112.7,50.16 113.67,49.2 U7.19 ; 104.2,46.55 104.2,45.15 R69.2 ; 104.2,46.55 R33.1
EMFB: length 11.4
  TOP w0.203: U7.20 113.03,47.95 112.83,47.75 R34.2 R27.2 C15.1 108,46.55 ; R70.2 108,45.15 108,46.55 ; 108,46.55 R35.1
EMFC: length 29.4
  TOP w0.203: R30.2 R23.2 C13.1 100.4,46.55 ; U7.1 113.03,41.53 109.7,38.2 100.2,38.2 99.3,39.1 99.3,42.73 101.02,44.45 R71.2 100.4,45.15 100.4,46.55 ; 100.4,46.55 R31.1
EN_MANUAL: length 68.7
  TOP w0.203: U12.3 117.45,26.75 118,26.2 121.3,26.2 122.9,27.8 141.3,27.8 143,29.5 143,63.95 SW1.3
H1: length 108.4
  TOP w0.254: U3.1 81.55,64.95 82.3,65.7 82.3,70.3 81.2,71.4 77,71.4 76.25,72.15 J1.4
  BOTTOM w0.254: J1.4 76.2,84.65 76.2,86 76.8,86.6 85.3,86.6 86.1,85.8 86.1,82.3 87.5,80.9 103.9,80.9 104.7,80.1 104.7,71.9 105.63,70.97 109.67,70.97 J7.8 109.5,74.4 109.5,83.5 110.4,84.4 126.4,84.4 J6.4
H2: length 108.9
  TOP w0.254: U3.3 80.47,66.25 81.7,67.48 81.7,70 80.8,70.9 74.9,70.9 73.75,72.05 J1.5
  BOTTOM w0.254: J6.5 128.9,84.9 109.9,84.9 108.8,83.8 108.8,74.3 J7.6 105.4,74.3 105.4,80.5 104.3,81.6 88,81.6 86.8,82.8 86.8,86.4 86,87.2 74.4,87.2 73.75,86.55 J1.5
H3: length 105.2
  TOP w0.254: J1.6 71.25,72.65 73.5,70.4 80.5,70.4 81.1,69.8 81.1,68 80.65,67.55 U3.5
  BOTTOM w0.254: J1.6 71.25,87.15 72,87.9 86.2,87.9 87.4,86.7 87.4,83.3 88.3,82.4 96.3,82.4 99.1,85.2 106.2,85.2 107.1,84.3 ; 107.1,84.3 J7.5 ; 107.1,84.3 108.2,85.4 131.4,85.4 J6.6
HIN1: length 6
  TOP w0.203: U7.10 118.75,42.8 118.95,42.6 U8.1
HIN2: length 15.8
  TOP w0.203: v1(125.22,44.67) 125.17,44.67 125.15,44.65 118.95,44.65 118.11,45.49 U7.12 ; U8.2 v1(125.22,41)
  BOTTOM w0.203: v1(125.22,41) v1(125.22,44.67)
HIN3: length 14.3
  TOP w0.203: U7.14 116.84,44.86 117.7,44 125.6,44 125.88,43.73 U8.3
HO1: length 25.3
  TOP w0.254: U8.19 v1(125.22,47.3)
  TOP w0.508: R9.1 v1(106.3,56.9)
  BOTTOM w0.508: v1(106.3,56.9) 111.9,51.3 119.8,51.3 123.8,47.3 v1(125.22,47.3)
HO2: length 19
  TOP w0.254: U8.16 v1(127.17,50.38)
  TOP w0.508: R11.1 v1(115.2,56.9)
  BOTTOM w0.508: v1(115.2,56.9) 115.2,55.41 115.71,54.9 124.4,54.9 127.17,52.12 v1(127.17,50.38)
HO3: length 16.5
  TOP w0.254: U8.13 v1(129.12,47.3)
  TOP w0.508: R13.1 v1(124.05,57.75)
  BOTTOM w0.508: v1(129.12,47.3) 129.9,48.08 129.9,53.3 125.45,57.75 v1(124.05,57.75)
IO0: length 5.8
  TOP w0.203: U1.25 28.35,86.05 28,86.4 26,86.4 25.6,86.8 J3.1
IS: length 5.9
  TOP w0.203: R42.1 C20.1 116.32,38.75 115.7,39.37 115.7,41.3 116.21,41.81 U7.6
LEDK: length 14.4
  TOP w0.254: J9.2 41.15,21.95 41.6,22.4 45.9,22.4 46.4,21.9 46.4,19.18 R54.1
LIN1: length 12.8
  TOP w0.203: U8.4 126.53,44.77 125.96,45.34 119.66,45.34 118.75,46.25 U7.11
LIN2: length 16.6
  TOP w0.203: U8.5 127.17,45.33 126.72,45.78 121.05,45.78 121.03,45.8 120.6,45.8 119.7,46.7 119.7,49.2 119.31,49.59 117.7,49.59 117.48,49.37 U7.13
LIN3: length 19.3
  TOP w0.203: U7.15 116.21,49.71 116.5,50 119.8,50 120.2,49.6 120.2,47.2 121.22,46.18 127.42,46.18 127.83,45.78 U8.6
LO1: length 31.7
  TOP w0.254: U8.11 130.43,47.02 130.01,46.61 122.99,46.61 122.6,47 v1(122.6,50.2)
  TOP w0.508: R10.1 v1(108.8,56.9)
  BOTTOM w0.508: v1(108.8,56.9) 108.8,56.3 112.7,52.4 121.8,52.4 122.6,51.6 v1(122.6,50.2)
LO2: length 41.1
  TOP w0.254: U8.10 v1(130.43,41.23)
  TOP w0.508: R12.1 v1(118.8,57.75)
  BOTTOM w0.508: v1(130.43,41.23) 132.2,43 132.2,53.45 122.65,63 117.5,63 116.8,62.3 116.8,58.4 117.45,57.75 v1(118.8,57.75)
LO3: length 17.3
  TOP w0.254: U8.9 v1(129.78,44.3)
  TOP w0.508: R14.1 v1(127.6,56.9)
  BOTTOM w0.508: v1(127.6,56.9) 131.3,53.2 131.3,45.83 v1(129.78,44.3)
M: length 2.9
  TOP w0.203: U7.17 114.94,50.61 R37.2
MOTOR_U: length 43.6
  TOP w0.254: R25.1 v1(103.5,49.5) ; U8.18 v1(125.88,50.38)
  BOTTOM w0.254: v1(105.1,63.6) 103.5,62 v1(103.5,49.5)
  BOTTOM w0.508: v1(108.9,62.1) 111.6,62.1 112.1,61.6 112.1,55.7 113.8,54 124.1,54 125.88,52.23 v1(125.88,50.38)
MOTOR_V: length 109.8
  TOP w0.254: v1(106.5,49.5) 107.3,48.7 R27.1 ; U8.15 v1(127.83,47.3)
  TOP w1.5: J6.2 121.8,84 120.97,84.83 116.5,84.83 115.4,83.73 115.4,76.6 114.1,75.3 101.5,75.3 J7.1 98.6,78 87.5,78 85.9,79.6 85.9,85.59 84.69,86.8 82.31,86.8 81.25,85.74 J1.2
  BOTTOM w0.254: v1(113.9,62.9) 105.5,62.9 104.3,61.7 104.3,50.6 105.4,49.5 v1(106.5,49.5)
  BOTTOM w0.508: v1(117.8,62) 122,62 122.9,61.1 122.9,57.3 123.5,56.7 125.2,56.7 129,52.9 129,48.5 127.83,47.33 v1(127.83,47.3)
MOTOR_W: length 113.1
  TOP w0.254: U8.12 129.78,51.1 ; R23.1 v1(99.7,49.5)
  TOP w0.508: 129.78,51.1 129.78,54.27 131.26,55.76 131.26,64.44 C7.2
  BOTTOM w0.254: v1(99.7,49.5) 102.2,49.5 102.6,49.9 102.6,67.8 104,69.2 104.4,69.2
  BOTTOM w1.5: J1.3 78.75,77.25 80.6,75.4 100.1,75.4 J7.4 102.9,70.7 104.4,69.2 123.3,69.2 124.8,70.7 J6.3
NRST: length 78.4
  TOP w0.203: SW7.3 14.15,26.95 19.4,32.2 59.5,32.2 64.6,37.3 64.6,38.43 65.22,39.05 C22.1 65.74,39.49 U5.7
  BOTTOM w0.508: SW7.4 SW7.3
OP_OUT: length 8.7
  TOP w0.203: 109.25,29.9 108.3,28.95 R53.1 ; 109.25,29.9 U10.1 ; 109.25,29.9 111.4,29.9 111.95,29.35 U11.1
OSC_IN: length 6.2
  TOP w0.203: U5.5 64.74,41.34 63.5,40.1 62.2,40.1 61.5,39.4 X1.1
OSC_OUT: length 4.7
  TOP w0.203: U5.6 65.24,41.24 63.9,39.9 X1.3
PA0/SCL: length 65.2
  TOP w0.203: J9.9 v1(37.65,19.35)
  TOP w0.254: U5.14 v1(69.24,44.14)
  BOTTOM w0.254: v1(69.24,44.14) 69.24,43.46 69.7,43 72.6,43 73.9,41.7 73.9,28.7 72.1,26.9 46.2,26.9 44.9,25.6 44.9,20.6 44.34,20.04 38.34,20.04 v1(37.65,19.35)
PA1/SDA: length 62.3
  TOP w0.203: J9.12 v1(36.15,19.35)
  TOP w0.254: U5.15 v1(69.74,41.54)
  BOTTOM w0.254: v1(69.74,41.54) 72.56,41.54 73.3,40.8 73.3,29.3 71.7,27.7 45.8,27.7 44.2,26.1 44.2,21.3 43.6,20.7 37.5,20.7 v1(36.15,19.35)
PA2/RES: length 64.6
  TOP w0.203: J9.7 v1(38.65,19.35)
  TOP w0.254: U5.16 v1(70.24,44.16)
  BOTTOM w0.254: v1(70.24,44.16) 70.6,43.8 72.7,43.8 74.5,42 74.5,28.2 72.4,26.1 46.4,26.1 45.5,25.2 45.5,20 44.85,19.35 v1(38.65,19.35)
PA3/DC: length 69.3
  TOP w0.203: J9.10 v1(37.15,16.15)
  TOP w0.254: U5.17 v1(70.9,44.8)
  BOTTOM w0.254: v1(70.9,44.8) 72.7,44.8 75,42.5 75,27.5 72.9,25.4 47.3,25.4 46.1,24.2 46.1,17.9 45.2,17 38,17 v1(37.15,16.15)
PA4/CS: length 73.3
  TOP w0.203: J9.8 v1(38.15,16.15) ; U5.20 v1(70.9,46.3)
  BOTTOM w0.254: v1(38.15,16.15) 46.15,16.15 46.9,16.9 46.9,23.8 47.5,24.4 73.2,24.4 75.6,26.8 75.6,46.1 75,46.7 71.3,46.7 v1(70.9,46.3)
PA5/VREF: length 49.4
  TOP w0.203: U5.21 v1(78.7,46.8)
  TOP w0.254: U10.3 v1(107.35,32.15)
  BOTTOM w0.203: v1(78.7,46.8) 83.4,46.8 84.3,45.9 84.3,33.7 85.85,32.15 v1(107.35,32.15)
PA6/BLK: length 57.6
  TOP w0.203: U5.22 v1(70.9,47.3)
  TOP w0.254: Q5.1 v1(48.1,23.5)
  BOTTOM w0.254: v1(70.9,47.3) 75.4,47.3 76.2,46.5 76.2,26.2 73.5,23.5 v1(48.1,23.5)
PA8/LED0: length 59.3
  TOP w0.203: U5.41 66.24,55.46 64.81,56.89 64.81,63.59 63.51,64.89 50.71,64.89 50,65.6 50,81.7 50.6,82.3 60.7,82.3 61.4,83 61.4,87.7 60.64,88.46 D3.2
PA9/USART1_TX: length 49.2
  TOP w0.203: J5.3 51.88,86.68 49.38,84.18 49.38,65.31 50.21,64.49 63.32,64.49 64.4,63.41 64.4,56.71 65.74,55.36 U5.42
PA10/USART1_RX: length 53.9
  TOP w0.203: U5.43 65.24,55.16 63.9,56.5 63.9,63.2 63.1,64 49.99,64 48.98,65.02 48.98,84.48 50.6,86.1 50.6,88.59 51.36,89.36 53.16,89.36 J5.4
PA11/SPEED: length 56.3
  TOP w0.203: v1(108.6,50.9) 111.9,50.9 113.05,52.05 R43.2 R37.1 ; v1(71,51.5) 69.7,52.8 65.1,52.8 64.74,53.16 U5.44
  BOTTOM w0.203: v1(108.6,50.9) 108.6,48.3 108.2,47.9 87.9,47.9 85.7,50.1 72.4,50.1 v1(71,51.5)
PA15/H1: length 26.6
  TOP w0.203: U5.50 v1(69,51.8) ; v1(71.1,66.2) TP3.1 72.35,66.25 U3.12
  BOTTOM w0.203: v1(71.1,66.2) 71.1,60.3 69,58.2 v1(69,51.8)
PB0/CTL_HALL: length 45.3
  TOP w0.203: R6.1 66.4,66.25 U2.4 66.55,62.65 67.2,62 82.91,62 83.4,61.51 83.4,50.19 82.51,49.3 U5.26
PB1/HALL_OC: length 49.7
  TOP w0.203: U2.3 66.4,69.15 R5.1 63.92,69.15 63.4,68.63 63.4,66.7 66,64.1 66,62.5 66.91,61.59 82.61,61.59 82.9,61.3 82.9,50.4 82.3,49.8 U5.27
PB3/H2: length 30.8
  TOP w0.203: U3.10 72.45,67.55 TP2.1 v1(71.1,67.7) ; v1(69,50.1) 62.5,50.1 61.7,49.3 U5.55
  BOTTOM w0.203: v1(71.1,67.7) 70.44,67.04 70.44,60.44 68.34,58.34 68.34,50.76 v1(69,50.1)
PB5/WK_UP: length 88
  TOP w0.203: SW4.3 12.5,48.95 12.5,60.8 13.4,61.7 55,61.7 55.4,61.3 55.4,49 55.69,48.71 58.36,48.71 58.77,48.3 U5.57
  BOTTOM w0.508: SW4.4 SW4.3
PB6/IIC_SCL: length 18.8
  TOP w0.203: 52.85,49.4 52.85,51.4 R18.1 52.82,51.45 52.2,52.07 52.2,53.7 52.4,53.9 54.7,53.9 54.9,53.7 54.9,48.5 55.1,48.31 58.19,48.31 58.7,47.8 U5.58
PB7/IIC_SDA: length 10.1
  TOP w0.203: R19.1 54.12,51.43 U6.5 54.1,49.38 54.1,48.3 54.5,47.9 57.9,47.9 58.5,47.3 U5.59
PB8/KEY0: length 71.1
  TOP w0.203: SW2.3 15.81,58.44 15.81,47.59 17.1,46.3 U5.61
  BOTTOM w0.508: SW2.4 SW2.3
PB9/KEY1: length 68.5
  TOP w0.203: SW5.3 15.81,36.16 15.81,44.41 17.2,45.8 U5.62
  BOTTOM w0.508: SW5.4 SW5.3
PB10/H3: length 27.7
  TOP w0.203: U5.29 v1(67.6,50.8) ; v1(71.1,69.2) TP1.1 72.65,68.85 U3.8
  BOTTOM w0.203: v1(67.6,50.8) 67.6,58.3 70.03,60.73 70.03,68.13 v1(71.1,69.2)
PB12/SPI2_CS: length 13.4
  TOP w0.203: U5.33 75.15,54.4 R16.2 75.45,56.25 76.2,57 81.05,57 U4.1
PB13/SPI2_SCK: length 8.3
  TOP w0.203: U5.34 69.74,59.04 70.23,59.53 U4.6
PB14/SPI2_MISO: length 18.1
  TOP w0.203: U5.35 69.24,59.64 69.8,60.2 74.5,60.2 76.44,58.27 U4.2
PB15/SPI2_MOSI: length 10.4
  TOP w0.203: U5.36 68.74,60.14 69.4,60.8 73.14,60.8 U4.5
PC0/WORK_CURR: length 11.8
  TOP w0.203: TP4.1 63.55,33.75 R48.2 C26.2 66.35,33.8 U9.4 66.35,36.22 66.34,36.23 66.34,36.77 66.35,36.78 U9.3 66.24,37.71 U5.8
PC1/WORK_VOLT: length 13.5
  TOP w0.203: U5.9 66.74,39.26 67.65,38.35 U9.1 67.65,36.78 67.66,36.77 67.66,36.23 67.65,36.22 U9.6 67.65,33.8 C27.1 R49.2 R50.1 71.65,33.75 TP5.1
PC4/EN: length 63.3
  TOP w0.203: U5.24 v1(78.7,48.3)
  TOP w0.254: U12.1 v1(115.55,26.9)
  BOTTOM w0.203: v1(78.7,48.3) 84.2,48.3 85.2,47.3 85.2,34.6 86.7,33.1 109.4,33.1 109.6,32.9 109.6,29 110.4,28.2 114.25,28.2 v1(115.55,26.9)
PC5/Z/F: length 71.2
  TOP w0.203: U5.25 71.5,48.8 v1(71,49.3)
  TOP w0.254: U13.1 v1(119.15,26.9)
  BOTTOM w0.203: v1(71,49.3) 85.1,49.3 86.2,48.2 86.2,35.4 87.7,33.9 110.1,33.9 110.3,33.7 110.3,30.4 111,29.7 118.4,29.7 119.2,28.9 119.2,26.95 v1(119.15,26.9)
PC9/BEEP: length 2.3
  TOP w0.203: U5.40 66.74,56.64 Q4.1
PC10/USART3_TX: length 3.5
  TOP w0.203: R17.2 58.65,51.3 U5.51
PC11/USART3_RX: length 3.3
  TOP w0.203: U5.52 57.95,50.8 R22.2
PD2/LED1: length 41.4
  TOP w0.203: v1(58.2,83.9) 58.2,87.8 58.86,88.46 D2.2
  TOP w0.254: U5.54 v1(59.4,49.8)
  BOTTOM w0.254: v1(58.2,83.9) 60.13,81.97 60.13,50.53 v1(59.4,49.8)
SWCLK: length 56.2
  TOP w0.203: U5.49 59.2,52.3 58.7,52.8 58.7,62.3 57.9,63.1 40.2,63.1 38.58,64.72 J4.3
SWDIO: length 57.3
  TOP w0.203: J4.4 41.12,65.08 42.61,63.59 58.11,63.59 59.2,62.51 59.2,53.3 59.6,52.9 63.3,52.9 63.74,53.34 U5.46
TC: length 49.9
  TOP w0.203: U7.8 117.48,39.85 117.68,39.65 R38.2 117.88,39.65 118.5,39.03 118.5,35.47 118.97,35 133,35 133.9,35.9 R68.1
TORQUE: length 6.5
  TOP w0.203: R45.1 R39.2 119.35,38.75 119.9,39.3 119.9,40.3 118.11,42.09 U7.9
U0_RX: length 74.5
  TOP w0.203: J2.4 16.92,85.3 U1.34 16.92,83.96 17.78,83.11 35.16,83.11 35.57,82.7 35.57,64.23 37.2,62.6 56,62.6 56.65,61.95 R17.1
U0_TX: length 76
  TOP w0.203: R22.1 56,51.85 56,61.8 55.61,62.19 37.03,62.19 37.03,62.2 36.8,62.2 35,64 35,82.5 34.8,82.7 16.91,82.7 15.65,83.96 U1.35 15.65,86.57 J2.3
VB1: length 25.1
  TOP w0.254: U8.20 124.58,49.23 v1(123.5,50.3)
  TOP w0.508: v1(111.2,59.5) D5.2 C5.1
  BOTTOM w0.508: v1(111.2,59.5) 111.2,55.4 113.4,53.2 122.5,53.2 123.5,52.2 v1(123.5,50.3)
VB2: length 22.8
  TOP w0.254: U8.17 v1(126.53,47.3)
  TOP w0.508: C6.1 D6.2 120.45,60.45 121.4,59.5 v1(121.4,57.8)
  BOTTOM w0.508: v1(121.4,57.8) 121.4,56.7 122.3,55.8 124.8,55.8 128.1,52.5 128.1,48.9 126.53,47.33 v1(126.53,47.3)
VB3: length 14.8
  TOP w0.254: 128.47,51.1 U8.14
  TOP w0.508: C7.1 D7.2 128.47,59.02 128.47,51.1
VOD: length 5.7
  TOP w0.203: U7.3 114.3,39.37 113.68,38.75 R36.2 R41.1
VR: length 13.8
  TOP w0.203: U11.4 113.85,33.95 111.5,36.3 111.5,39.03 112.12,39.65 C18.1 113.67,41.12 U7.2
VR_MANUAL: length 34.2
  TOP w0.203: U11.3 113.85,28.75 114.59,29.49 140.29,29.49 141.5,30.7 141.5,34.8 J8.2
Z/F: length 26.4
  TOP w0.203: U7.16 115.57,51.12 R21.1
  TOP w0.254: v1(118.3,34.4) 120.7,34.4 121.05,34.05 U13.4 ; U7.16 v1(115.57,47.1)
  BOTTOM w0.254: v1(115.57,47.1) 114.2,45.73 114.2,39.2 115,38.4 117.5,38.4 118.3,37.6 v1(118.3,34.4)
Z/F_MANUAL: length 43.5
  TOP w0.203: U13.3 140.4,28.4 142,30 142,47.85 SW3.3
N17026698: length 1.3
  TOP w0.203: D2.1 R2.2
N17026724: length 1.3
  TOP w0.203: D1.1 R1.2
N17062865: length 1.3
  TOP w0.203: D3.1 R3.2
N17066432: length 30.9
  TOP w0.203: 63.2,7.8 63.2,8 63.7,8.5 63.7,30.2 64.5,31 69.6,31 70.2,31.6 R50.2
N17083504: length 4.8
  TOP w0.203: U16.3 135.05,12 R66.1 ; R66.1 C36.1 ; R66.1 R60.2
N17083827: length 3.5
  TOP w0.203: U16.4 127.75,12 R65.2 R59.2
N17083986: length 1.9
  TOP w0.203: U16.1 132.4,10.1 131.85,9.55 C46.2
N17083989: length 2.9
  TOP w0.203: C46.1 130.95,9.55 130.4,10.1 U16.6
  TOP w0.254: U16.6 129.5,10.1 129.2,9.8
N17085455: length 3.5
  TOP w0.203: R57.2 R63.2 106.85,12 U15.4
N17085459: length 4.8
  TOP w0.203: R64.1 R58.2 ; R64.1 C35.1 ; R64.1 114.15,12 U15.3
N17085552: length 2.9
  TOP w0.203: U15.6 109.5,10.1 110.05,9.55 C43.1
  TOP w0.254: U15.6 108.6,10.1 108.3,9.8
N17085554: length 1.9
  TOP w0.203: U15.1 111.5,10.1 110.95,9.55 C43.2
N17086217: length 3.5
  TOP w0.203: U14.4 85.85,12 R61.2 R55.2
N17086221: length 4.8
  TOP w0.203: R62.1 R56.2 ; R62.1 93.15,12 U14.3 ; R62.1 C34.1
N17086314: length 2.9
  TOP w0.203: C40.1 89.05,9.55 88.5,10.1 U14.6
  TOP w0.254: 87.3,9.8 87.6,10.1 U14.6
N17086316: length 1.9
  TOP w0.203: C40.2 89.95,9.55 90.5,10.1 U14.1
N17111393: length 1.8
  TOP w0.508: R9.2 106.27,58.68 Q1.2
N17111395: length 26
  TOP w0.254: v1(107.5,52) R15.2 ; R42.2 v1(116.4,35.7)
  BOTTOM w0.254: v1(107.5,52) 108.9,52 111.5,49.4 111.5,37.3 112.2,36.6 115.5,36.6 v1(116.4,35.7)
N17111400: length 1.8
  TOP w0.508: Q1.4 108.81,58.66 R10.2
N17111480: length 1.8
  TOP w0.508: R11.2 115.27,58.72 Q2.2
N17111487: length 1.8
  TOP w0.508: Q2.4 117.81,58.66 R12.2
N17111504: length 1.8
  TOP w0.508: Q3.2 125.07,58.72 R13.2
N17111511: length 1.8
  TOP w0.508: Q3.4 127.61,58.66 R14.2
N17111630: length 5.6
  TOP w0.203: U3.9 U3.6
N17111633: length 5.6
  TOP w0.203: U3.11 U3.4
N17111636: length 5.6
  TOP w0.203: U3.13 U3.2
N17119104: length 3.5
  TOP w0.203: R53.2 108.08,25.65 107.18,26.55 R52.1 107.35,26.8 U10.4
N17120846: length 25.1
  TOP w0.203: U17.7 63.07,32.17 63.75,32.85 R48.1
N17129272: length 8
  TOP w0.203: R4.2 C1.2 13.95,69.85 14.4,69.4 14.4,67.62 U1.3
N17133162: length 14.7
  TOP w0.254: D4.2 B1.2 63.5,65.9 65.5,63.9 65.5,61.9 67.15,60.25 R8.1
N17136365: length 1.4
  TOP w0.508: R54.2 Q5.3
N17144294: length 1.3
  TOP w0.203: R67.2 D12.1
N17151200: length 1.3
  TOP w0.203: R69.1 Q6.3
N17151376: length 1.3
  TOP w0.203: R70.1 Q7.3
N17151530: length 1.3
  TOP w0.203: R71.1 Q8.3
N171331741: length 1.5
  TOP w0.203: Q4.3 R8.2

## Copper pours and planes (outline as drawn; the poured copper is in the pictures)
GND on TOP: 149.7,3.2 148.85,1.15 146.8,0.3 3.2,0.3 1.15,1.15 0.3,3.2 0.3,86.8 1.15,88.85 3.2,89.7 146.8,89.7 148.85,88.85 149.7,86.8 ; 50 cut-outs
GND on BOTTOM: 149.7,3.2 148.85,1.15 146.8,0.3 3.2,0.3 1.15,1.15 0.3,3.2 0.3,86.8 1.15,88.85 3.2,89.7 146.8,89.7 148.85,88.85 149.7,86.8 ; 32 cut-outs
VCC_3.3V on TOP (solid shape): 100,8.6 100,5.7 93.1,5.7 92.2,4.8 92.2,3.1 90.7,3.1 90.7,7.4 90.8,7.5 92.2,7.5 93.5,8.8 99.8,8.8
VCC_3.3V on TOP: 12.6,68.6 12.6,66.3 12.5,66.2 10.4,66.2 10,66.6 5.1,66.6 5,66.5 5,65.1 5.1,65 13,65 13.6,65.6 13.6,68.6
VCC_3.3V on TOP: 39,16.4 48.3,16.4 49.1,17.2 49.1,18.6 53.8,18.6 53.9,18.5 53.9,15.9 53.5,15.5 39.2,15.5 39,15.7
VCC_3.3V on BOTTOM: 5.2,66.6 19,66.6 20,65.6 20,16.6 21.1,15.5 49.5,15.5 52.6,18.6 78,18.6 87.8,8.8 98.3,8.8 98.5,8.6 98.5,7.4 98.3,7.2 86.2,7.2 80,13.4 19.4,13.4 17,15.8 17,64.4 16.4,65 5.2,65 5,65.2 5,66.4
VCC_5V on TOP (solid shape): 121,8.9 121,5.7 114.1,5.7 113.2,4.8 113.2,3.1 111.7,3.1 111.7,7.4 111.8,7.5 113.1,7.5 114.6,9 120.9,9
VCC_5V on BOTTOM: 115.5,7.3 119.4,7.3 119.6,7.5 119.6,8.8 119.4,9 115.5,9 115.3,8.8 115.3,7.5
VCC_12V on TOP (solid shape): 141.9,8.7 141.9,5.7 135,5.7 134.1,4.8 134.1,3.1 132.6,3.1 132.6,7.4 132.7,7.5 134,7.5 135.5,9 141.6,9
VCC_12V on BOTTOM: 136.4,7.4 140.3,7.4 140.5,7.6 140.5,8.8 140.3,9 136.4,9 136.2,8.8 136.2,7.6
VCC_24V on TOP (solid shape): 106.6,67.5 106.6,65 95.5,65 94.9,64.4 94.9,18.5 95.8,17.6 123.2,17.6 123.9,16.9 123.9,11.9 124.4,11.4 127.18,11.4 127.2,11.39 127.3,11.35 127.4,11.34 128,11.34 128.1,11.35 128.2,11.39 128.22,11.4 129.2,11.4 129.36,11.28 129.55,11.24 130.65,11.24 130.69,11.24 130.77,11.21 130.8,11.14 130.8,10.95 130.77,10.88 130.69,10.85 130.65,10.85 129.55,10.85 129.36,10.81 129.21,10.7 128.9,10.7 127.4,9.2 122.2,9.2 122.2,14.7 121.6,15.3 104,15.3 103.5,14.8 103.5,11.7 103.8,11.4 106.28,11.4 106.3,11.39 106.4,11.35 106.5,11.34 107.1,11.34 107.2,11.35 107.3,11.39 107.32,11.4 108.3,11.4 108.46,11.28 108.65,11.24 109.75,11.24 109.79,11.24 109.87,11.21 109.9,11.14 109.9,10.95 109.87,10.88 109.79,10.85 109.75,10.85 108.65,10.85 108.46,10.81 108.31,10.7 108,10.7 106.5,9.2 101.3,9.2 101.3,14.7 100.7,15.3 82.8,15.3 82.2,14.7 82.2,12 82.8,11.4 85.28,11.4 85.3,11.39 85.4,11.35 85.5,11.34 86.1,11.34 86.2,11.35 86.3,11.39 86.32,11.4 87.3,11.4 87.46,11.28 87.65,11.24 88.75,11.24 88.79,11.24 88.87,11.21 88.9,11.14 88.9,10.95 88.87,10.88 88.79,10.85 88.75,10.85 87.65,10.85 87.46,10.81 87.31,10.7 87,10.7 85.5,9.2 74.8,9.2 70.6,5 68.35,5 68.19,5.12 68,5.16 67.4,5.16 67.21,5.12 67.05,5 66.8,5 66.5,4.7 66.5,3.2 64,3.2 64,7.9 64.29,8.19 65.91,8.19 65.95,8.19 65.99,8.2 66.5,8.2 67,8.7 67,19 67.9,19.9 89.7,19.9 90.7,20.9 90.7,67.2 91.3,67.8 106.3,67.8
VCC_24V on TOP: 125.5,64.9 122.8,64.9 122.6,65.1 122.6,67.4 122.9,67.7 125.3,67.7 125.5,67.5
VCC_24V on TOP: 115.7,64.9 113,64.9 112.8,65.1 112.8,67.4 113.1,67.7 115.5,67.7 115.7,67.5
VCC_24V on BOTTOM: 103.4,67.9 125.2,67.9 125.6,67.5 125.6,65.2 125.1,64.7 103.5,64.7 103.1,65.1 103.1,67.6
VCC_24V_IN on TOP: 10.5,7.1 10.5,14.5 11,15 44.3,15 44.7,14.6 44.7,10.2 44.1,9.6 35.9,9.6 34.2,11.3 32.7,11.3 30.5,9.1 13.3,9.1 12.7,8.5 12.7,7.1 12.1,6.5 11.1,6.5
(no net) on TOP: 111.7,3.1 111.7,7.4 111.8,7.5 113.1,7.5 114.6,9 120.9,9 121,8.9 121,5.7 114.1,5.7 113.2,4.8 113.2,3.1
(no net) on TOP: 132.6,3.1 132.6,7.4 132.7,7.5 134,7.5 135.5,9 141.6,9 141.9,8.7 141.9,5.7 135,5.7 134.1,4.8 134.1,3.1
(no net) on TOP: 90.7,3.1 90.7,7.4 90.8,7.5 92.2,7.5 93.5,8.8 99.8,8.8 100,8.6 100,5.7 93.1,5.7 92.2,4.8 92.2,3.1
(no net) on TOP: 84.1,3.1 88.2,3.1 88.3,3.2 88.3,10.4 87.6,10.4 85.3,8.1 85.3,6.2 84.1,5
(no net) on TOP: 126,3.1 130.1,3.1 130.2,3.2 130.2,10.4 129.5,10.4 127.2,8.1 127.2,6.2 126,5
(no net) on TOP: 91.3,67.8 106.3,67.8 106.6,67.5 106.6,65 95.5,65 94.9,64.4 94.9,18.5 95.8,17.6 123.2,17.6 123.9,16.9 123.9,11.9 124.4,11.4 130.8,11.4 130.8,10.7 128.9,10.7 127.4,9.2 122.2,9.2 122.2,14.7 121.6,15.3 104,15.3 103.5,14.8 103.5,11.7 103.8,11.4 109.9,11.4 109.9,10.7 108,10.7 106.5,9.2 101.3,9.2 101.3,14.7 100.7,15.3 82.8,15.3 82.2,14.7 82.2,12 82.8,11.4 88.9,11.4 88.9,10.7 87,10.7 85.5,9.2 74.8,9.2 70.6,5 66.8,5 66.5,4.7 66.5,3.2 64,3.2 64,7.9 64.3,8.2 66.5,8.2 67,8.7 67,19 67.9,19.9 89.7,19.9 90.7,20.9 90.7,67.2
(no net) on TOP: 105.1,3.1 109.2,3.1 109.3,3.2 109.3,10.4 108.6,10.4 106.3,8.1 106.3,6.2 105.1,5
MOTOR_U on TOP: 104.7,59.6 104.7,64.2 105,64.5 106.9,64.5 107.2,64.8 107.2,67.8 106.7,68.3 83.7,68.3 82.9,69.1 82.9,85.4 84.6,85.4 84.6,74.5 85.2,73.9 99.1,73.9 99.9,73.1 99.9,71.1 100.3,70.7 112.9,70.7 112.95,70.75 117.05,70.75 117.9,71.6 117.9,83.9 119.7,83.9 119.7,70.1 117.8,68.2 112.7,68.2 112.2,67.7 112.2,64.9 109.8,64.9 109.4,64.5 109.4,62.1 109,61.7 105.9,61.7 105.3,61.1 105.3,59.6
MOTOR_V on TOP: 116.2,64.8 116.2,67.5 116.4,67.7 118.2,67.7 121,70.5 121,83.4 121.4,83.8 122.2,83.8 122.7,83.3 122.7,68.4 121.1,66.8 121.1,64.9 118.7,64.9 118.4,64.6 118.4,62 118,61.6 114.9,61.6 114.4,61.1 114.4,59.6 113.6,59.6 113.6,64.1 113.9,64.4 115.8,64.4
